# Altium PCB Main-Board-V1.1.PcbDoc (part 1 of 5)
Units mil, origin at the board's own origin, x right, y up, seen from the top; angles counter-clockwise.
Board outline 3599.72 x 1771.65 mil, 4 copper layers (Top Layer, Layer 1, Layer 2, Bottom Layer), stack 62.449 mil thick; 176 components, 132 nets, 634 pads, 296 vias.
Unrouted connection lines stored in the file: 17.
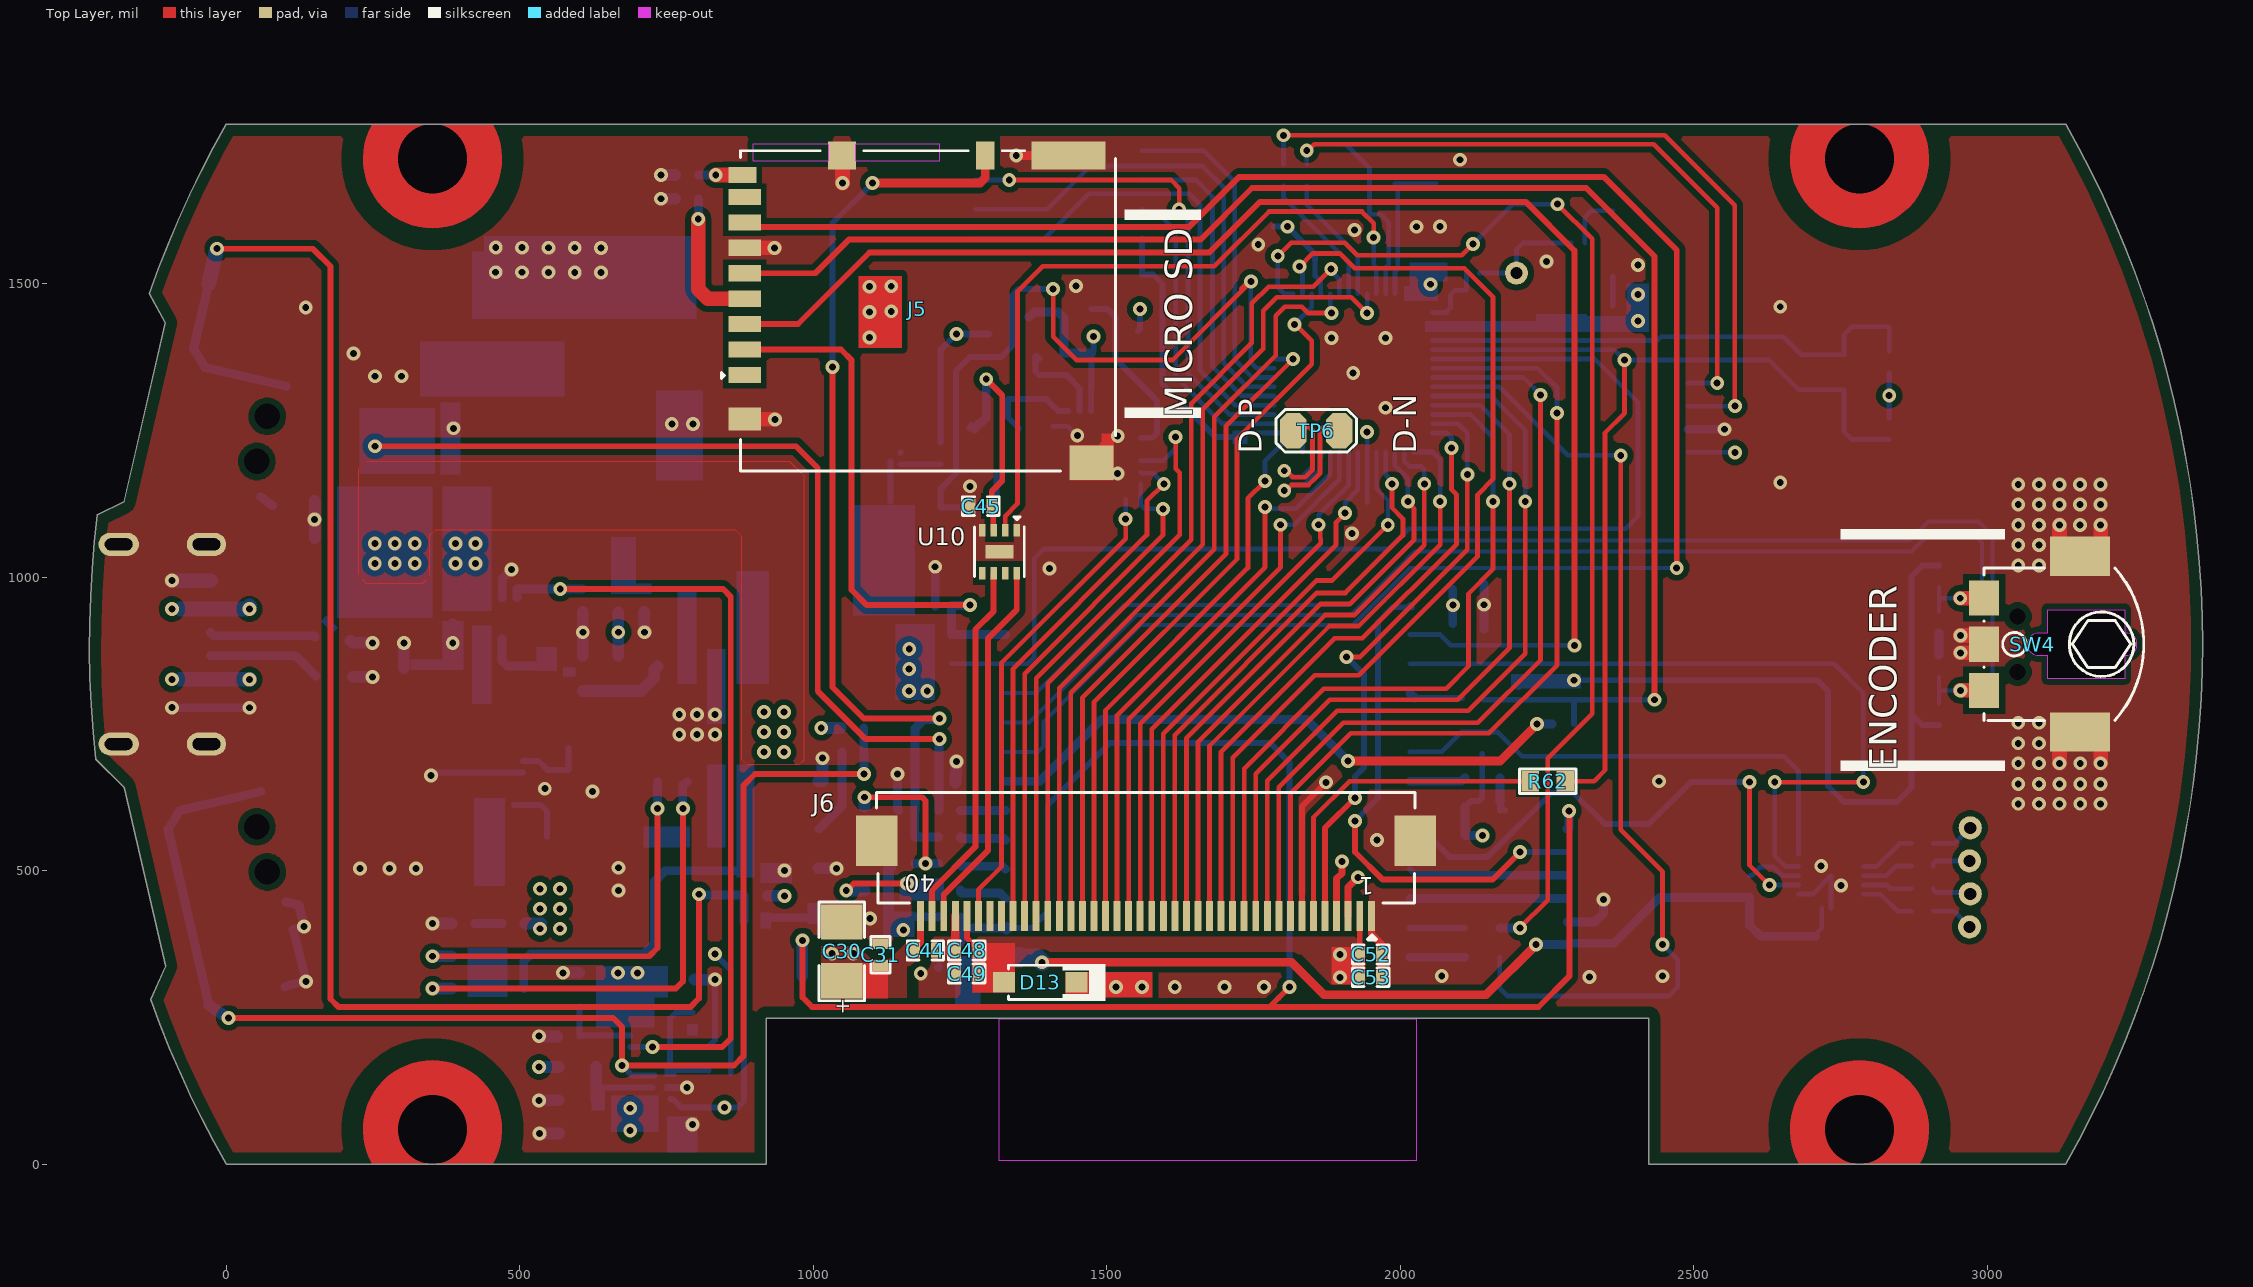
[diagram p0: Top Layer view]
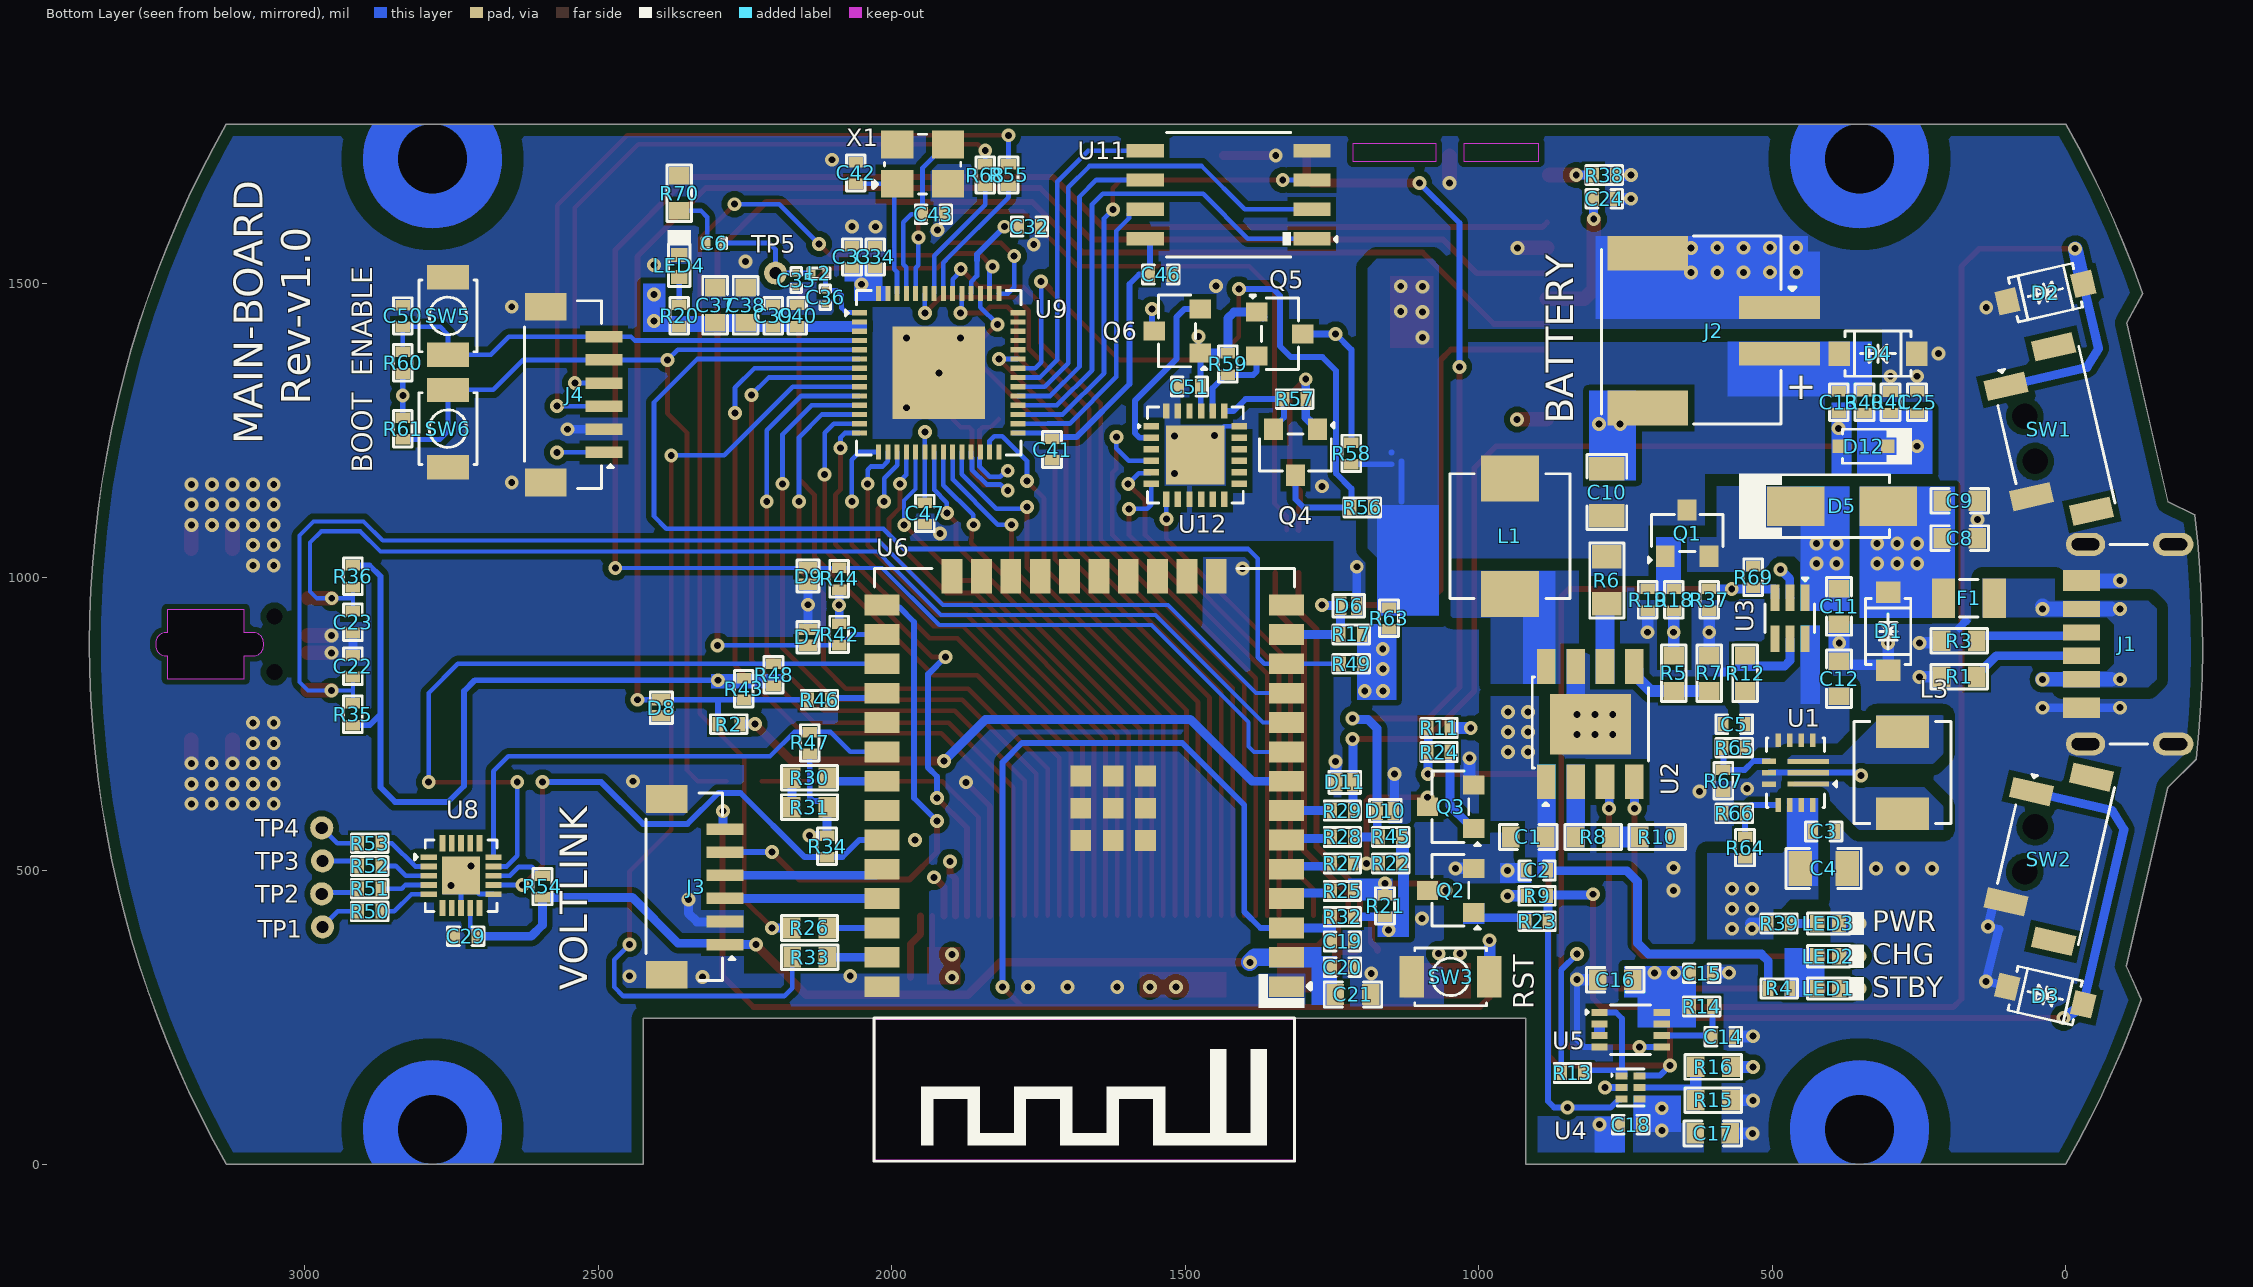
[diagram p1: Bottom Layer view, seen from below]
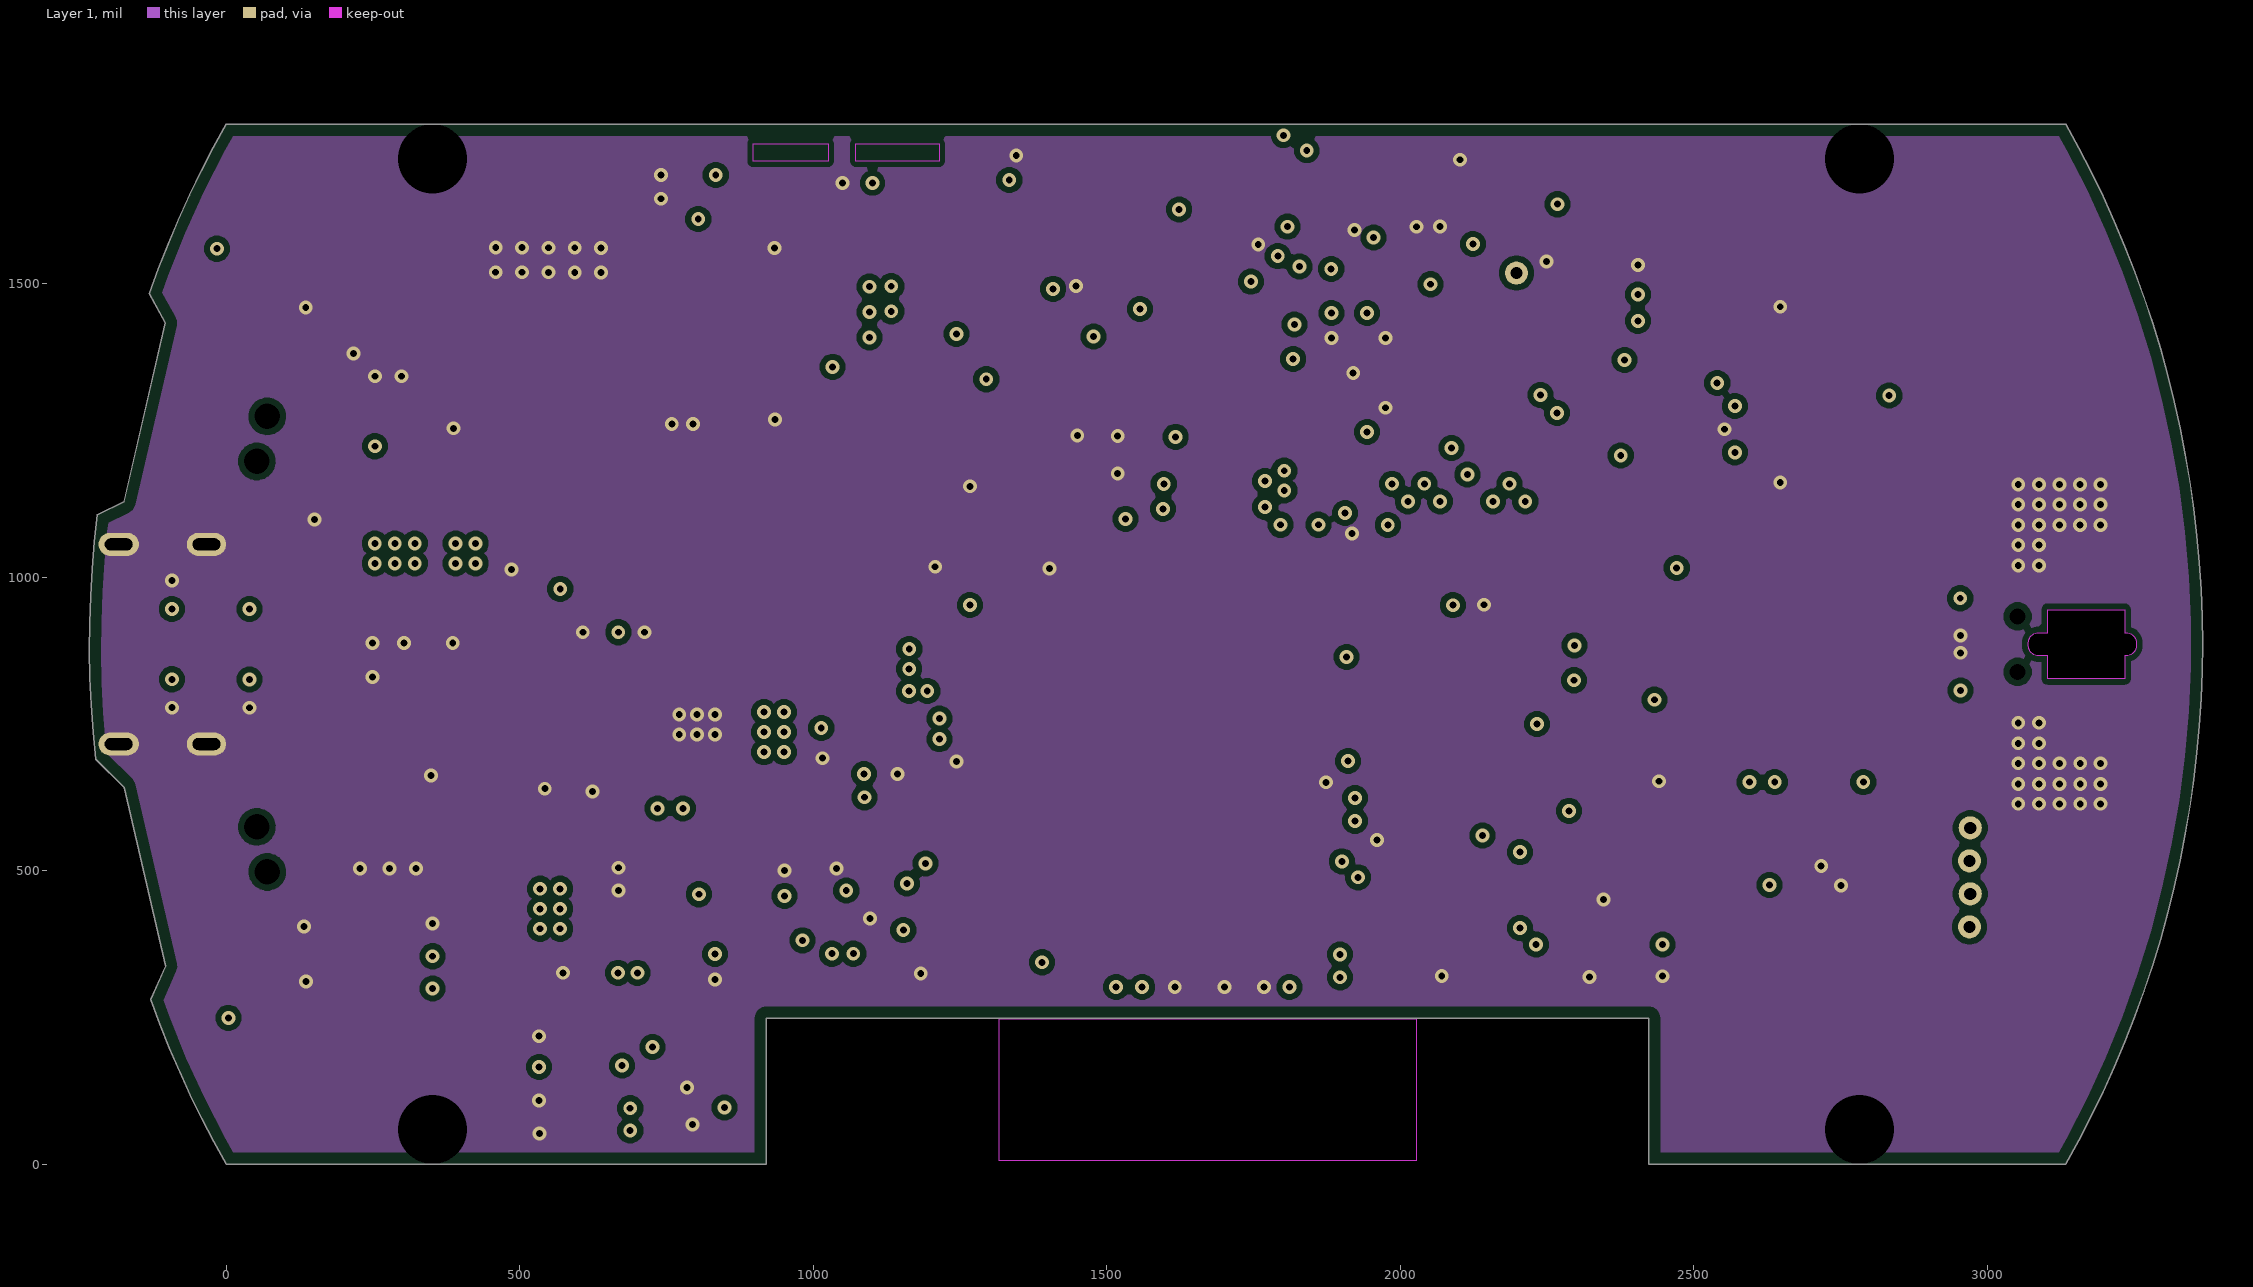
[diagram p2: Layer 1]
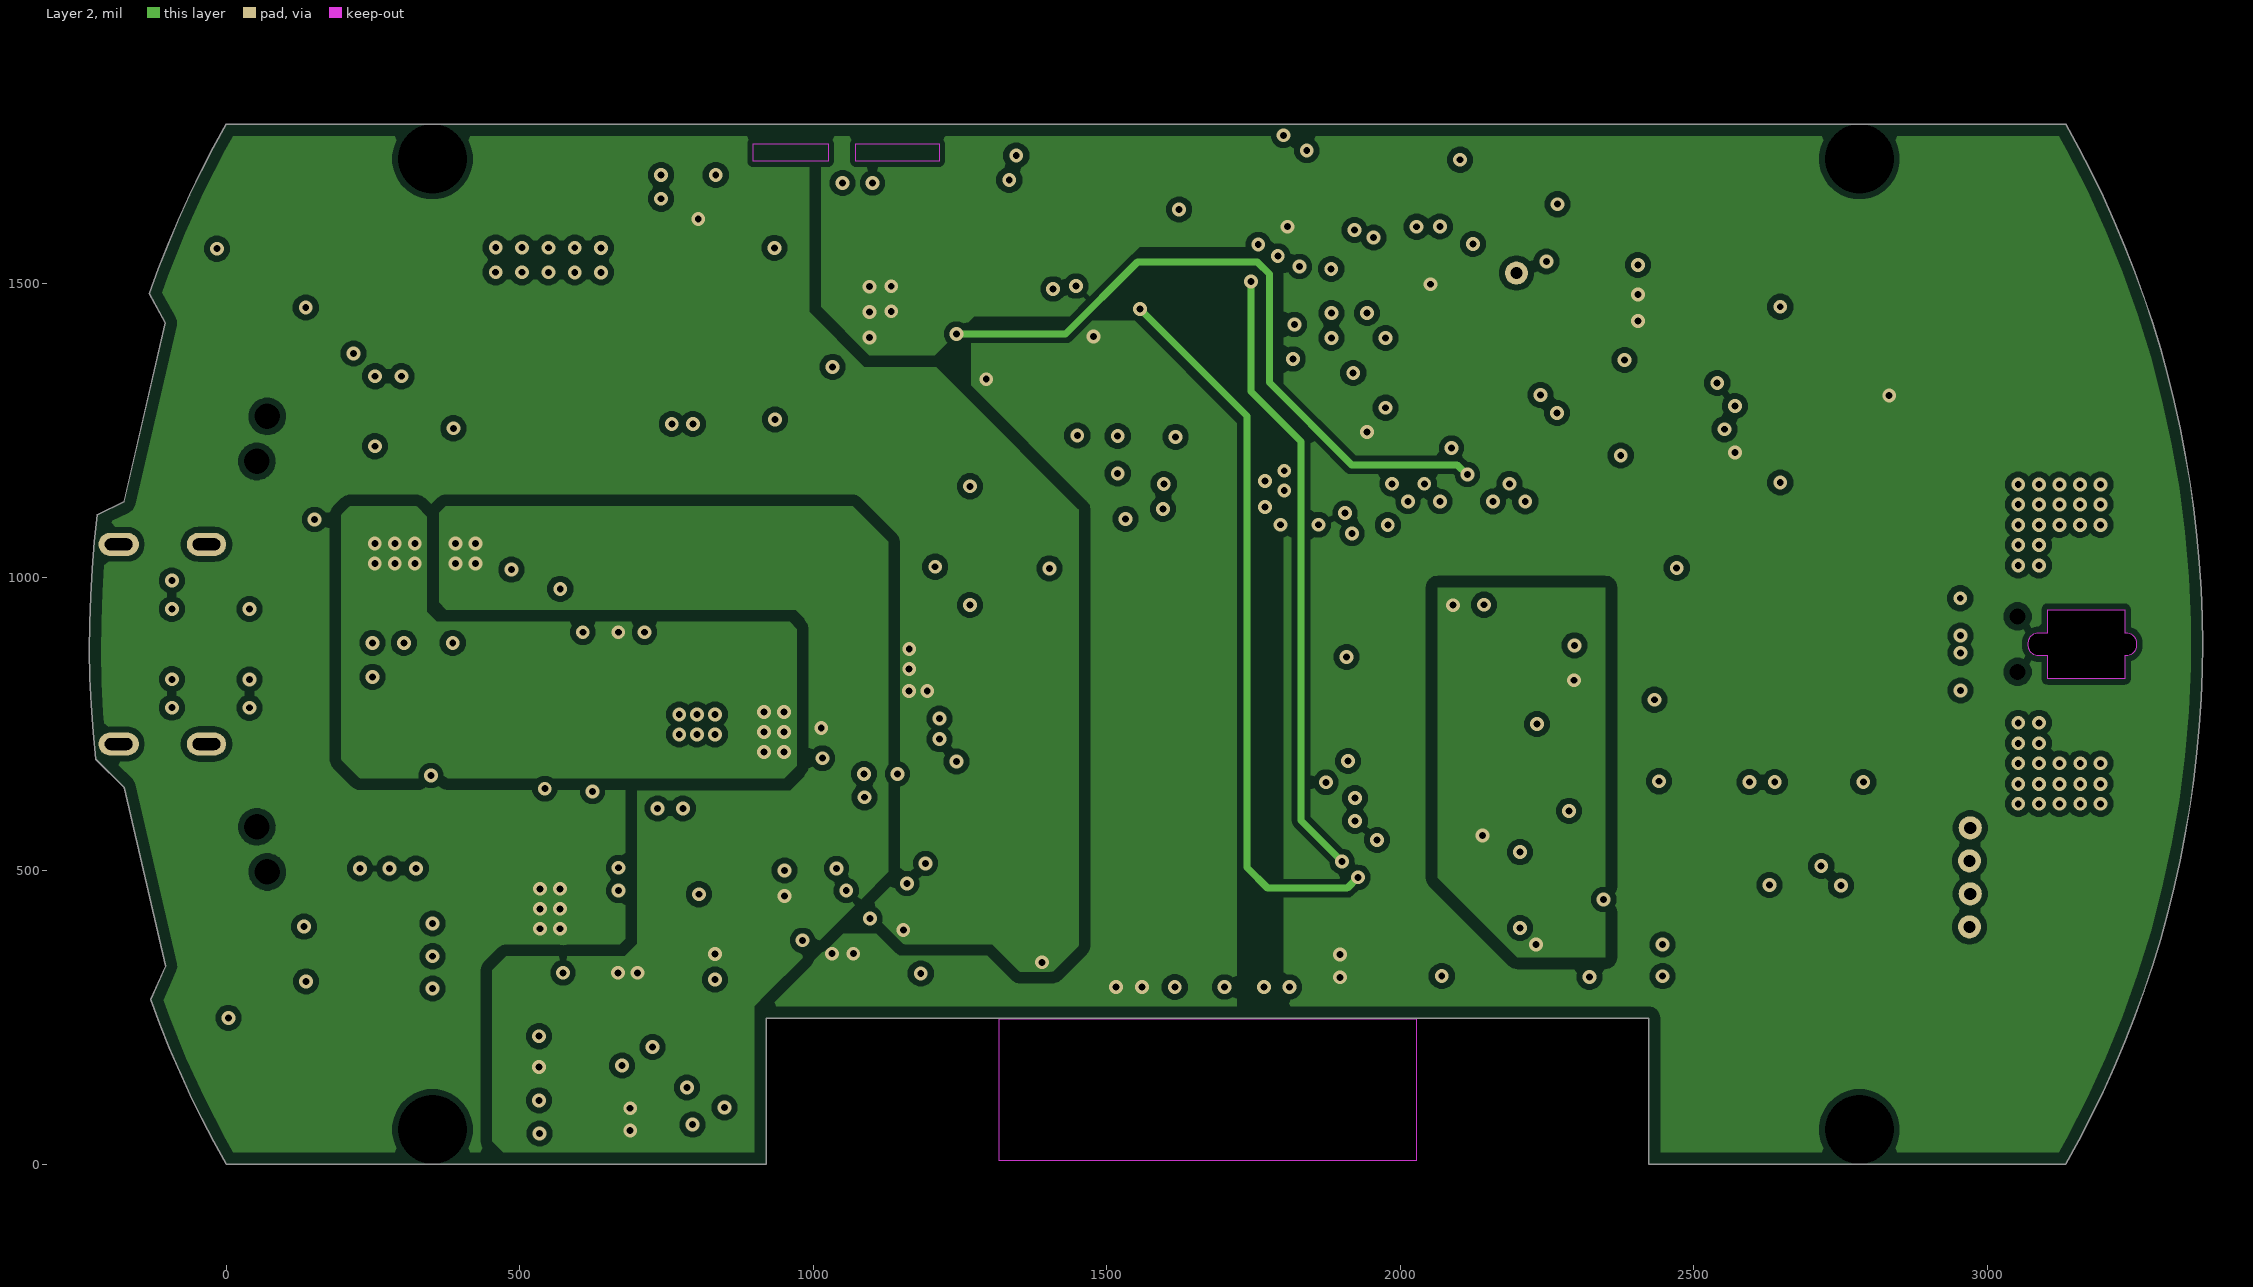
[diagram p3: Layer 2]
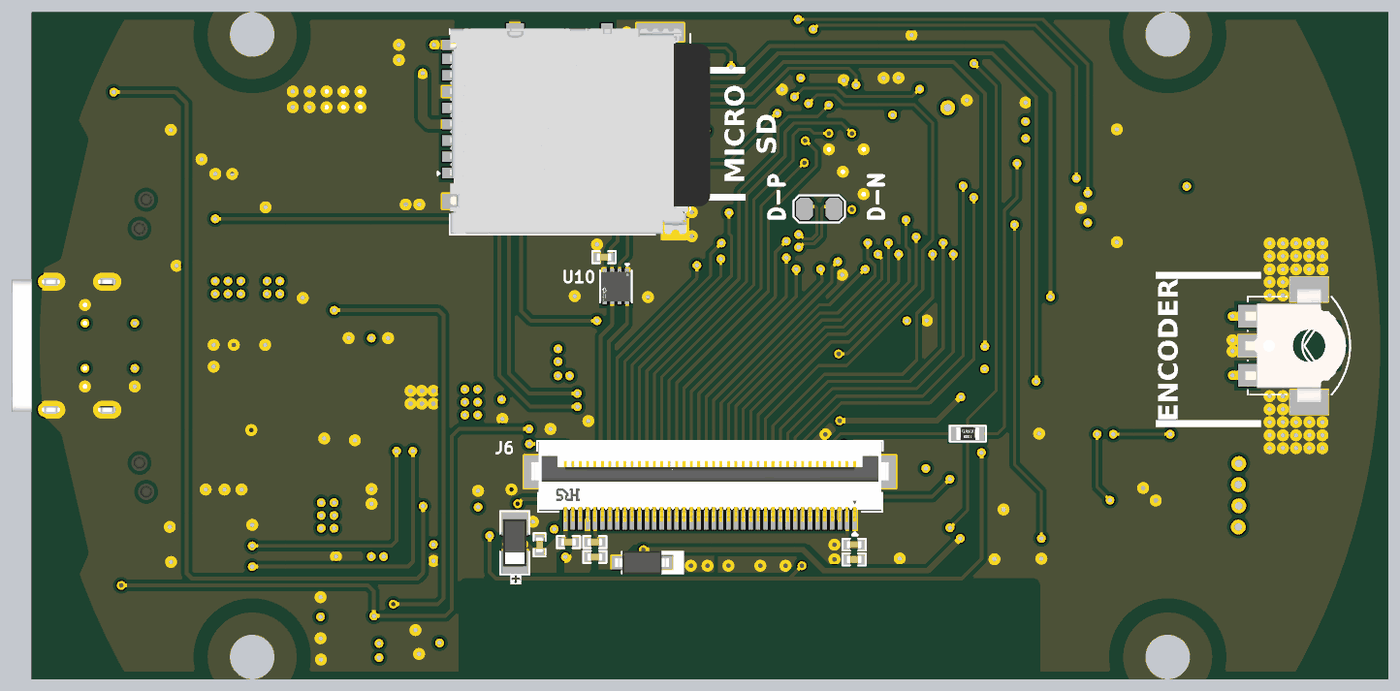
[diagram p6: 3D render of the assembled board from above, using the file's embedded part models]
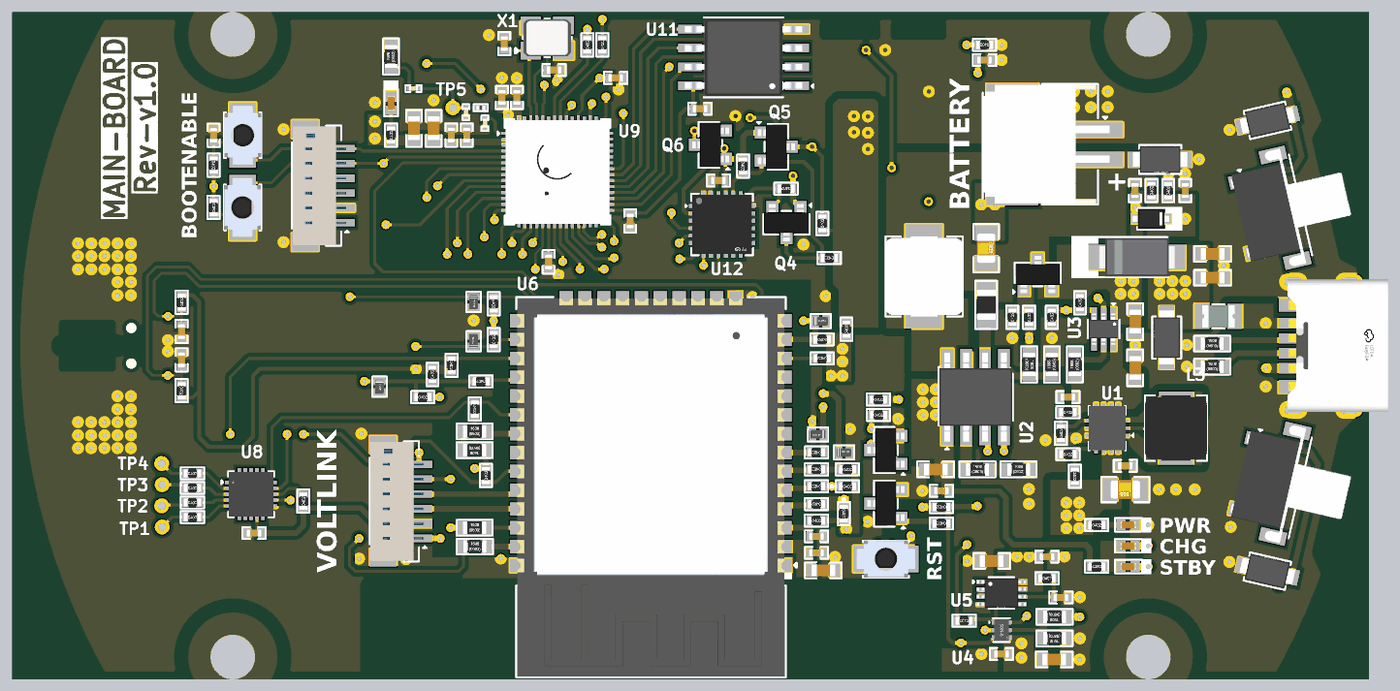
[diagram p7: 3D render of the assembled board from below, using the file's embedded part models]

## Layer stack, top to bottom
Top Solder: solder mask 0.4, Solder Resist, Dk 3.5
Top Layer: signal copper 1.378
Dielectric 2: prepreg 8.2839, PP-006, Dk 4.1
Layer 1: signal copper 0.598
Dielectric 1: dielectric 41.9291, FR-4, Dk 4.8
Layer 2: signal copper 0.598
Dielectric 3: prepreg 8.2839, PP-006, Dk 4.1
Bottom Layer: signal copper 1.378
Bottom Solder: solder mask 0.4, Solder Resist, Dk 3.5

## Board outline
-222.34,689.82 cw(c1569.7,885.13) -219.31,1106.51 -218.82,1106.36 -174.03,1128.39 -103.62,1433.37 -131.18,1482.83 cw(c1566.72,885.89) 0,1771.65 3133.72,1771.65 cw(c1566.86,885.83) 3133.72,0 2423.66,0 2423.66,248.66 920.25,248.66 920.25,0 0,0 cw(c1557.46,883.14) -128.45,280.38 -103.3,336.87 -173.7,641.84
cut-out: 3102.95,826.76 3102.95,866.14 3087.25,866.14 cw(c3087.25,883.14) 3070.25,883.14 3070.25,888.5 cw(c3087.25,888.5) 3087.25,905.5 3102.95,905.5 ccw(c3102.95,905.5) 3102.96,905.51 3102.96,944.87 3233.99,944.87 3233.99,905.51 3236.77,905.51 cw(c3236.77,888.5) 3253.78,888.51 3253.78,883.15 cw(c3236.77,883.15) 3236.77,866.15 3234.14,866.15 3234.14,826.76

## Design rules (kind name [scope] priority, off if disabled: settings)
BoardOutlineClearance [All] p1: gap=0 ignorepadtopadclearanceinfootprint=FALSE except(20: Poly-OutlineEdge)
Clearance "Diff Clearance" [InDifferentialPair('USB_D')] p1: gap=10 ignorepadtopadclearanceinfootprint=TRUE except(5: Track-Track; 6: Track-SMDPad; 7: Arc-SMDPad Track-Fill SMDPad-SMDPad SMDPad-Fill; 9.96: Poly-Region; 20: Poly-Poly)
Clearance [All] p2: gap=10 ignorepadtopadclearanceinfootprint=TRUE except(6: Track-SMDPad; 7: Arc-SMDPad Track-Track Track-Fill SMDPad-SMDPad SMDPad-Fill; 20: Poly-Poly)
ComponentClearance [All] p1: gap=0 collisioncheckmode=3 verticalgap=0 showdistances=FALSE
DiffPairsRouting [All] p1: maxlimit=10 minlimit=5 mostfreqgap=10 toplayer_maxgap=5 toplayer_prefgap=5 toplayer_minwidth=8 toplayer_maxwidth=8 toplayer_prefwidth=8 bottomlayer_maxgap=5 bottomlayer_prefgap=5 bottomlayer_minwidth=8 bottomlayer_maxwidth=8 bottomlayer_prefwidth=8 impedanceprofiledriven=TRUE impedanceprofileid={B2FD1A95-CDA7-4210-B10D-5F027658617E} impedanceprofilevalue=90.000000 maxuncoupledlength=500
HoleSize [All] p1: absolutevalues=TRUE maxlimit=1000 minlimit=1 maxpercent=80.000 minpercent=20.000
MinimumSolderMaskSliver [All] p1: minsoldermaskwidth=0
PolygonConnect [All] p1: connectstyle=Direct reliefconductorwidth=10 reliefentries=4 polygonreliefangle="90 Angle" airgapwidth=10
RoutingVias [All] p1: holewidth=11.81 width=23.62 viastyle="Through Hole" minholewidth=11.81 minwidth=23.62 maxholewidth=11.81 maxwidth=23.62
SilkToSilkClearance [All] p1: silktosilkclearance=0
SilkToSolderMaskClearance [IsPad] p1: minsilkscreentomaskgap=0 clearancetoexposedcopper=TRUE
SolderMaskExpansion [All] p1: expansion=4 istentingtop=FALSE
Width [All] p1: maxlimit=50 minlimit=7 preferedwidth=15
24 further rules are at their usual default settings.

## Classes and differential pairs
component class U_Screen-Controller-Sheet: C6 C30 C31 C32 C33 C34 C35 C36 C37 C38 C39 C40 C41 C42 C43 C44 C45 C46 C47 C48 C49 C50 C51 C52 C53 D13 J4 J6 L2 Q4 Q5 Q6 R55 R56 R57 R58 R59 R60 R61 R62 R68 R70 SW5 SW6 TP5 TP6 U9 U10 U11 U12 X1
component class U_Power-Sheet: C1 C2 C3 C4 C5 C8 C9 C10 C11 C12 C13 C14 C15 C16 C17 C18 D1 D2 D3 D4 D5 F1 J1 J2 L1 L3 LED1 LED2 LED3 LED4 Q1 R1 R3 R4 R5 R6 R7 R8 R9 R10 R11 R12 R13 R14 R15 R16 R18 R19 R20 R37 R39 R40 R41 R63 R64 R65 R66 R67 R69 SW1 SW2 U1 U2 U3 U4 U5
component class U_Controller-Sheet: C19 C20 C21 C22 C23 C24 C25 C29 D6 D7 D8 D9 D10 D11 D12 J3 J5 Q2 Q3 R2 R17 R21 R22 R23 R24 R25 R26 R27 R28 R29 R30 R31 R32 R33 R34 R35 R36 R38 R42 R43 R44 R45 R46 R47 R48 R49 R50 R51 R52 R53 R54 SW3 SW4 TP1 TP2 TP3 TP4 U6 U8
differential pair USB_D: +USB_D_P -USB_D_N

## Components (designator, comment, footprint, x,y, rotation, side; value= is the part's Value field where it differs from the comment)
C1 "10uF" Cap-0603 915.79,557.36 r180 bottom locked
C2 "0.1uF" Cap-0402 900.79,500.45 r180 bottom locked value=100nF
C3 "10uF" Cap-0402 412.51,566.86 r0 bottom
C4 "47uF" Cap-0805 412.52,503.86 r0 bottom
C5 "10uF" Cap-0402 564.87,749.61 r180 bottom
C6 "4.7pF" CAP-0201 2302.61,1569.09 r0 bottom
C8 "1uF" Cap-0603 180.76,1066.54 r0 bottom locked
C9 "10nF" Cap-0603 180.76,1130.04 r0 bottom locked
C10 "22uF" Cap-0805 782,1145 r270 bottom locked
C11 "10uF" Cap-0603 386.39,950.06 r270 bottom locked
C12 "10uF" Cap-0603 386.39,827.06 r90 bottom locked
C13 "0.1uF" Cap-0402 386.95,1298 r90 bottom locked value=100nF
C14 "0.1uF" Cap-0402 583.47,217.21 r0 bottom locked value=100nF
C15 "0.1uF" Cap-0402 620.47,325.31 r0 bottom locked value=100nF
C16 "1uF" Cap-0603 767.43,314.31 r180 bottom locked
C17 "1uF" Cap-0603 601.47,52.31 r0 bottom locked
C18 "0.1uF" Cap-0402 741.43,67.31 r180 bottom locked value=100nF
C19 "1uF" Cap-0402 1232.32,379.51 r180 bottom
C20 "100nF" Cap-0402 1232.32,335.66 r0 bottom locked
C21 "22uF" Cap-0603 1214.32,289.08 r0 bottom locked
C22 "0.01uF" Cap-0402 2918,848.43 r270 bottom locked
C23 "0.01uF" Cap-0402 2918,923.37 r90 bottom locked
C24 "0.1uF" Cap-0402 786.06,1644.61 r180 bottom locked value=100nF
C25 "0.1uF" Cap-0402 253.35,1298 r270 bottom locked value=100nF
C29 "100nF" Cap-0402 2725.73,388.36 r0 bottom
C30 "47uF" Tant-1206 1048.64,362.4 r90 top
C31 "100nF" Cap-0402 1114.56,356.98 r270 top
C32 "100nF" Cap-0402 1765.52,1597.24 r0 bottom
C33 "1uF" Cap-0402 2067.8,1545.41 r270 bottom
C34 "100nF" Cap-0402 2028.03,1545.41 r270 bottom
C35 "2.7pF" CAP-0201 2163,1506.19 r90 bottom
C36 "4.7pF" CAP-0201 2113.06,1476.99 r90 bottom
C37 "22uF" Cap-0603 2301,1463.5 r270 bottom
C38 "22uF" Cap-0603 2249,1463.51 r270 bottom
C39 "100nF" Cap-0402 2202,1445.5 r270 bottom
C40 "100nF" Cap-0402 2161,1445.5 r270 bottom
C41 "1uF" Cap-0402 1727.04,1217.45 r90 bottom
C42 "18pF" Cap-0402 2061.34,1688.5 r270 bottom
C43 "18pF" Cap-0402 1929.06,1618.23 r0 bottom
C44 "1uF" Cap-0402 1191.23,364.15 r180 top
C45 "4.7uF" Cap-0402 1285.57,1121 r0 top
C46 "100nF" Cap-0402 1541.72,1515.58 r180 bottom
C47 "100nF" Cap-0402 1943.62,1108.5 r90 bottom
C48 "100nF" Cap-0402 1261.5,364.14 r0 top
C49 "1uF" Cap-0402 1261.5,324.76 r0 top
C50 "1uF" Cap-0402 2833.07,1444.95 r90 bottom
C51 "1uF" Cap-0402 1492.83,1324.71 r180 bottom
C52 "100nF" Cap-0402 1949.53,357.36 r180 top
C53 "1uF" Cap-0402 1949.53,318.36 r180 top
D1 "SMF5.0CA" "SOD-123 (Bi-Directional)" 302.65,907.56 r270 bottom locked
D2 "SMF5.0CA" "SOD-123 (Bi-Directional)" 34.78,1484.62 r347 bottom locked
D3 "SMF5.0CA" "SOD-123 (Bi-Directional)" 35.22,287.13 r13 bottom locked
D4 "SMF5.0CA" "SOD-123 (Bi-Directional)" 320,1380.63 r180 bottom locked
D5 "SM340A" SMA 381.39,1121 r180 bottom locked
D6 "LESD8D3.3CAT5G" "SOD-882 Bi Directional" 1221.55,951.1 r0 bottom locked
D7 "LESD8D3.3CAT5G" "SOD-882 Bi Directional" 2142.69,897.64 r270 bottom
D8 "LESD8D3.3CAT5G" "SOD-882 Bi Directional" 2392.48,777.33 r90 bottom
D9 "LESD8D3.3CAT5G" "SOD-882 Bi Directional" 2142.69,1001.95 r90 bottom
D10 "LESD8D3.3CAT5G" "SOD-882 Bi Directional" 1159.15,602.36 r0 bottom locked
D11 "LESD8D3.3CAT5G" "SOD-882 Bi Directional" 1228.32,650.36 r180 bottom locked
D12 "MM3Z3V3B" SOD323F 344.67,1223 r180 bottom locked
D13 "1N4148W-7-F" SOD-123 1386.69,309.83 r0 top value=2pF
F1 "BSMD0805L-200" Fuse-0805 165.27,964.09 r0 bottom locked
J1 "TYPE-C-31-M-17" TYPE-C-31-M-17_ -104.8,885.83 r90 bottom locked
J2 "WAFER-PH2.0-2PWB" WAFER-PH2.0-2PWB 600,1420 r270 bottom
J3 "Voltlink Target" "Voltlink Target" 2333.43,472.44 r90 bottom locked
J4 "Voltlink Target" "Voltlink Target" 2540,1311 r90 bottom
J5 "DM3BT-DSF-PEJS" DM3BT-DSF-PEJS 1177,1456.67 r90 top locked
J6 "FH12-40S-0.5SH(55)" FH12-40S-0.5SH(55) 1566.86,486.98 r180 top
L1 "2.2uH" YSPI0520-2R2M_ 947,1069.83 r90 bottom locked
L2 "1.6nH" IND-0201 2123.88,1518 r180 bottom
L3 "1uH" PSPMAA0412-1R0M-ANP_ 278.07,666.98 r270 bottom
LED1 "XZVG68W-2" LED-0402 404.95,299.17 r180 bottom locked
LED2 "Red" LED-0402 404.95,354.17 r180 bottom locked
LED3 "Red" LED-0402 405,410 r180 bottom locked
LED4 "Red" LED-0402 2362,1530.08 r90 bottom
Q1 "AO3407" SOT-23 645,1075 r180 bottom locked
Q2 "AO3400A" sot-23 1048.1,466.5 r90 bottom locked
Q3 "AO3400A" sot-23 1048.1,608.86 r90 bottom locked
Q4 "BSS123" sot-23 1312.35,1212.78 r0 bottom
Q5 "BSS123" SOT-23 1339.08,1414.39 r270 bottom
Q6 "BSS123" SOT-23 1513.7,1419.4 r90 bottom
R1 "5.1K" Res-0603 181.76,830.15 r0 bottom locked
R2 "0R" Res-0402 2277.54,749.6 r180 bottom
R3 "5.1K" Res-0603 181.76,891.65 r0 bottom locked
R4 "1K" Res-0402 488.35,299.31 r0 bottom locked
R5 "0R" Res-0603 668,836.06 r90 bottom locked
R6 "1K" RES-0805 782,994.54 r90 bottom locked value=1kR
R7 "DNP" Res-0603 607.5,836.06 r270 bottom locked
R8 "953R" Res-0603 805.08,557.36 r0 bottom locked
R9 "10K" Res-0402 900.79,457.13 r0 bottom locked
R10 "15R" Res-0603 695.83,557.36 r0 bottom locked
R11 "10K" Res-0402 1067.68,743 r180 bottom locked
R12 "1K" Res-0603 546.37,836.06 r270 bottom locked value=1kR
R13 "1.5K" Res-0402 840.47,155.49 r0 bottom locked
R14 "4.7K" Res-0402 620.47,268.49 r180 bottom locked
R15 "0R" Res-0603 600.47,108.72 r180 bottom locked
R16 "DNP" Res-0603 600.47,165.72 r180 bottom locked
R17 "10K" Res-0402 1217.32,902.36 r180 bottom locked
R18 "47K" Res-0402 668,961.54 r90 bottom locked
R19 "100K" Res-0402 712.37,961.54 r90 bottom locked
R20 "DNP" Res-0402 2362,1445.51 r90 bottom
R21 "10K" Res-0402 1159.65,439.86 r270 bottom
R22 "10K" Res-0402 1150.15,512.36 r180 bottom
R23 "1K" Res-0402 900.79,413.96 r0 bottom locked
R24 "1K" Res-0402 1067.68,702.06 r180 bottom locked
R25 "100R" Res-0402 1232.32,465.36 r0 bottom locked
R26 "0R" Res-0603 2140.2,402.36 r0 bottom locked
R27 "100R" Res-0402 1232.33,512.36 r0 bottom locked
R28 "0R" Res-0402 1232.33,557.36 r0 bottom locked
R29 "0R" Res-0402 1232.32,602.36 r0 bottom locked
R30 "0R" Res-0603 2140.2,658.36 r0 bottom
R31 "DNP" Res-0603 2140.2,608.36 r180 bottom
R32 "10K" Res-0402 1232.32,421.36 r180 bottom
R33 "0R" Res-0603 2139.69,352.36 r0 bottom
R34 "4.7K" Res-0402 2110.2,541.34 r90 bottom
R35 "10K" Res-0402 2918,766.5 r270 bottom locked
R36 "10K" Res-0402 2918,1001.5 r90 bottom locked
R37 "DNP" Res-0402 607.5,961.54 r90 bottom locked
R38 "0R" Res-0402 786.06,1685.01 r0 bottom locked
R39 "DNP" Res-0402 488.5,410 r180 bottom locked
R40 "200K" Res-0402 343,1298 r90 bottom locked value=200kR
R41 "100K" Res-0402 298.54,1297.78 r90 bottom locked
R42 "10K" Res-0402 2089.64,902.36 r90 bottom
R43 "10K" Res-0402 2252.22,809.61 r90 bottom
R44 "10K" Res-0402 2089.64,997.23 r270 bottom
R45 "10K" Res-0402 1150.15,557.36 r180 bottom
R46 "DNP" Res-0402 2123.2,791.11 r0 bottom
R47 "4.7K" Res-0402 2139.69,717.6 r270 bottom
R48 "4.7K" Res-0402 2201.43,833.86 r270 bottom
R49 "4.7K" Res-0402 1217.08,852.36 r0 bottom
R50 "10K" Res-0402 2889.38,430.64 r180 bottom
R51 "10K" Res-0402 2889.37,469.35 r180 bottom
R52 "10K" Res-0402 2889.37,508.06 r180 bottom
R53 "10K" Res-0402 2889.37,546.76 r180 bottom
R54 "4.7K" Res-0402 2595,472.97 r90 bottom
R55 "499R" Res-0402 1801.02,1685.05 r90 bottom
R56 "4.7K" Res-0402 1198.63,1118.7 r0 bottom
R57 "4.7K" Res-0402 1313.34,1303.28 r0 bottom
R58 "4.7K" Res-0402 1217.13,1210.77 r90 bottom
R59 "4.7K" Res-0402 1427.48,1363.13 r270 bottom
R60 "10K" Res-0402 2833.08,1365.42 r270 bottom
R61 "10K" Res-0402 2833.08,1253.06 r90 bottom
R62 "DNP" Res-0603 2251.43,652.36 r0 top
R63 "0R" Res-0402 1153,929.72 r90 bottom
R64 "562K" Res-0402 546.37,539.36 r270 bottom
R65 "147K" Res-0402 564.87,709.41 r180 bottom value=147kR
R66 "180K" Res-0402 564.87,597.65 r180 bottom value=180kR
R67 "95.3K" Res-0402 583.37,653.2 r90 bottom
R68 "0R" Res-0402 1840.82,1685.05 r90 bottom
R69 "1K" Res-0402 532.64,1000.1 r90 bottom
R70 "49.9R" Res-0603 2362.01,1654 r270 bottom
SW1 "TP12422673" TP12422673 34.32,1241.65 r257 bottom locked
SW2 "TP12422673" TP12422673 34.32,530 r283 bottom locked
SW3 "GT-TC032A-H015-L1" GT-TC032A-H015-L1 1048.1,319.08 r0 bottom locked
SW4 "EC05E1220401" EC05E1220401 3076.38,885.82 r270 top locked
SW5 "GT-TC032A-H015-L1" GT-TC032A-H015-L1 2756,1444.95 r90 bottom
SW6 "GT-TC032A-H015-L1" GT-TC032A-H015-L1 2756,1253.06 r270 bottom
TP1 "0.5mm Test Pad" "0.5mm Test Pad" 2969.73,404.36 r90 bottom
TP2 "0.5mm Test Pad" "0.5mm Test Pad" 2971.04,460.57 r90 bottom
TP3 "0.5mm Test Pad" "0.5mm Test Pad" 2969.73,516.79 r90 bottom
TP4 "0.5mm Test Pad" "0.5mm Test Pad" 2971.04,573 r90 bottom
TP5 "0.5mm Test Pad" "0.5mm Test Pad" 2198,1518 r90 bottom
TP6 "2 Test Pad" "2 Test Pad" 1817.64,1249.26 r0 top
U1 "TPS630250RNCR" "14-VQFN-HR (3x2.5)" 468.41,666.98 r0 bottom
U2 "SLM6600" 8-SO-EP_ 810,749.61 r90 bottom locked
U3 "TPS22919DCKR" SC-70-6 470,930 r270 bottom locked
U4 "DNP" "6-SON (1.45x1)" 741.43,130.81 r180 bottom locked
U5 "DNP" VFSOP-8-2.3mm 741.43,228.96 r180 bottom locked
U6 "ESP32-WROOM-32E-N8R2" "38-SMD Module" 1672.05,651.97 r0 bottom locked
U8 "AT42QT1070-MMHR" "20-VQFN (3x3)" 2733.73,491.47 r180 bottom
U9 "ESP32-S3R8" "56-QFN (7x7)" 1920,1348 r180 bottom
U10 "AW9364DNR" DFN-8-EP(2x2) 1317.18,1043.36 r270 top
U11 "W25Q128JVSIQ" "SOIC-8 (208 mil)" 1426.29,1651.58 r0 bottom
U12 "XL9535QF24" QFN-24(4x4) 1482.99,1207.94 r180 bottom
X1 "40MHz" X322540MPB4SI_ 1947.56,1703.46 r180 bottom value=40MHZ

## Footprints (in the part's own frame and the unit in brackets; to place one, negate y for a bottom-side part, rotate by r counter-clockwise, add the part's x,y. Pads: shape width x height; smd on the part's side, far side on the other; paste and mask are expansions set on the pad)
"0.5mm Test Pad" [mm]
  round 1 hole 0.52: 1(0,0)
"2 Test Pad" [mil]
  oct 45x60 smd: 1(0,0) 2(78.74,0)
  silkscreen extent -29,-36 108,36
"6-SON (1.45x1)" [mm]
  rect 0.52x0.3 smd paste+0 mask+0.051: 1(-0.385,0.5) 2(-0.385,0) 3(-0.385,-0.5) 4(0.385,-0.5) 5(0.385,0) 6(0.385,0.5)
  silkscreen extent -0.83,-0.8 0.58,0.8, body extent -0.5,-0.72 0.5,0.73, height 0.56
8-SO-EP_ [mm]
  rect 1.505x0.802 smd: 1(-2.497,1.905) 2(-2.497,0.635) 3(-2.497,-0.635) 4(-2.497,-1.905) 5(2.498,-1.905) 6(2.498,-0.635) 7(2.497,0.635) 8(2.498,1.905)
  rect 2.613x3.502 smd: 9(0,0)
  silkscreen extent -3.53,-2.51 2.03,2.51, body extent -3,-2.45 3,2.45, height 1.7
"14-VQFN-HR (3x2.5)" [mm]
  rect 1.79x0.22 smd: 1(-0.755,0.49) 3(-0.755,-0.49)
  rect 1.79x0.24 smd: 2(-0.755,0)
  rect 0.24x0.6 smd: 4(-0.95,-1.4) 5(-0.45,-1.4) 6(0.05,-1.4) 7(0.55,-1.4) 11(0.55,1.4) 12(0.05,1.4) 13(-0.45,1.4) 14(-0.95,1.4)
  rect 0.6x0.24 smd: 8(0.95,-0.5) 9(0.95,0) 10(0.95,0.5)
  silkscreen extent -1.97,-1.5 1.05,1.5, body extent -1.45,-1.5 1.05,1.5, height 1
"20-VQFN (3x3)" [mm]
  rect 0.7x0.25 smd: 1(-1.4,0.8) 2(-1.4,0.4) 3(-1.4,0) 4(-1.4,-0.4) 5(-1.4,-0.8) 11(1.4,-0.8) 12(1.4,-0.4) 13(1.4,0) 14(1.4,0.4) 15(1.4,0.8)
  rect 0.25x0.7 smd: 6(-0.8,-1.4) 7(-0.4,-1.4) 8(0,-1.4) 9(0.4,-1.4) 10(0.8,-1.4) 16(0.8,1.4) 17(0.4,1.4) 18(0,1.4) 19(-0.4,1.4) 20(-0.8,1.4)
  rect 1.65x1.65 smd: 21(0,0)
  silkscreen extent -2.01,-1.55 1.55,1.55, body extent -1.5,-1.5 1.5,1.5, height 0.59
"38-SMD Module" [mm]
  rect 1.5x0.9 smd: 1(-8.75,8.88) 2(-8.75,7.61) 3(-8.75,6.34) 4(-8.75,5.07) 5(-8.75,3.8) 6(-8.75,2.53) 7(-8.75,1.26) 8(-8.75,-0.01) 9(-8.75,-1.28) 10(-8.75,-2.55) 11(-8.75,-3.82) 12(-8.75,-5.09) 13(-8.75,-6.36) 14(-8.75,-7.63) 25(8.75,-7.63) 26(8.75,-6.36) 27(8.75,-5.09) 28(8.75,-3.82) 29(8.75,-2.55) 30(8.75,-1.28) 31(8.75,-0.01) 32(8.75,1.26) 33(8.75,2.53) 34(8.75,3.8) 35(8.75,5.07) 36(8.75,6.34) 37(8.75,7.61) 38(8.75,8.88)
  rect 0.9x1.5 smd: 15(-5.71,-8.88) 16(-4.44,-8.88) 17(-3.17,-8.88) 18(-1.9,-8.88) 19(-0.63,-8.88) 20(0.64,-8.88) 21(1.91,-8.88) 22(3.18,-8.88) 23(4.45,-8.88) 24(5.72,-8.88)
  rect 0.9x0.9 smd: 39(-2.65,2.56) 40(-1.25,2.56) 41(0.15,2.56) 42(-2.65,1.16) 43(-1.25,1.16) 44(0.15,1.16) 45(-2.65,-0.24) 46(-1.25,-0.24) 47(0.15,-0.24)
  Keep-Out Layer region: -9.042,16.383 9.042,16.383 9.042,10.287 -9.042,10.287
  silkscreen extent -9.8,-9.22 9.09,16.43, body extent -9,-9.12 9,16.38, height 3.25
"56-QFN (7x7)" [mm]
  rect 0.65x0.22 smd mask+0.055: 1(-3.425,2.6) 2(-3.425,2.2) 3(-3.425,1.8) 4(-3.425,1.4) 5(-3.425,1) 6(-3.425,0.6) 7(-3.425,0.2) 8(-3.425,-0.2) 9(-3.425,-0.6) 10(-3.425,-1) 11(-3.425,-1.4) 12(-3.425,-1.8) 13(-3.425,-2.2) 14(-3.425,-2.6) 29(3.425,-2.6) 30(3.425,-2.2) 31(3.425,-1.8) 32(3.425,-1.4) 33(3.425,-1) 34(3.425,-0.6) 35(3.425,-0.2) 36(3.425,0.2) 37(3.425,0.6) 38(3.425,1) 39(3.425,1.4) 40(3.425,1.8) 41(3.425,2.2) 42(3.425,2.6)
  rect 0.22x0.65 smd mask+0.055: 15(-2.6,-3.425) 16(-2.2,-3.425) 17(-1.8,-3.425) 18(-1.4,-3.425) 19(-1,-3.425) 20(-0.6,-3.425) 21(-0.2,-3.425) 22(0.2,-3.425) 23(0.6,-3.425) 24(1,-3.425) 25(1.4,-3.425) 26(1.8,-3.425) 27(2.2,-3.425) 28(2.6,-3.425) 43(2.6,3.425) 44(2.2,3.425) 45(1.8,3.425) 46(1.4,3.425) 47(1,3.425) 48(0.6,3.425) 49(0.2,3.425) 50(-0.2,3.425) 51(-0.6,3.425) 52(-1,3.425) 53(-1.4,3.425) 54(-1.8,3.425) 55(-2.2,3.425) 56(-2.6,3.425)
  rect 4x4 smd mask+0.055: 57(0,0)
  silkscreen extent -4.04,-3.56 3.56,3.56, body extent -3.5,-3.51 3.5,3.49, height 0.92
CAP-0201 [mm]
  rect 0.3x0.3 smd mask+0.055: 1(-0.3,0) 2(0.3,0)
  silkscreen extent -0.53,-0.23 0.53,0.23, body extent -0.3,-0.15 0.3,0.15, height 0.28
Cap-0402 [mil]
  rect 18x25 smd mask+2.36: 1(-18.5,0) 2(18.5,0)
  silkscreen extent -31,-16 31,16, body extent -20,-10 20,10, height 19
Cap-0603 [mil]
  rect 30x35 smd mask+2.36: 1(-30,0) 2(30,0)
  silkscreen extent -49,-21 49,21, body extent -32,-16 31,16, height 34
Cap-0805 [mil] "SMD 0805"
  rect 40x60 smd mask+2.76: 1(-40,0) 2(40,0)
  silkscreen extent -64,-34 64,34, body extent -39,-25 39,25, height 30
DFN-8-EP(2x2) [mm]
  rect 0.55x0.28 smd: 1(-0.928,0.75) 2(-0.928,0.25) 3(-0.928,-0.25) 4(-0.928,-0.75) 5(0.928,-0.75) 6(0.928,-0.25) 7(0.928,0.25) 8(0.928,0.75)
  rect 0.6x1.2 smd: 9(0,0)
  silkscreen extent -1.51,-1.08 1.08,1.08, body extent -1.01,-1.01 1.01,1.01, height 0.77
DM3BT-DSF-PEJS [mm]
  rect 0.7x1.4 smd: 1(-2.85,7.45) 2(-1.75,7.45) 3(-0.65,7.45) 4(0.45,7.45) 5(1.55,7.45) 6(2.65,7.45) 7(3.75,7.45) 8(4.85,7.45)
  rect 1x1.4 smd: S1(-4.75,7.45)
  rect 1.2x1.2 smd: S2(6.65,3.25)
  rect 1.2x3.2 smd: S3(6.65,-6.55)
  rect 1.5x1.9 smd paste-2 mask+0: S4(-6.65,-7.55)
  rect 1.2x0.8 smd: SW-A(6.65,-2.95)
  rect 0.7x1.2 smd: SW-B(5.8,7.55)
  Top Layer region: -5.9,-7.85 -5.75,-8 -5.4,-8 -5.4,-8.5 -7.4,-8.5 -7.4,-6.6 -5.9,-6.6
  Keep-Out Layer region: 7.15,-0.95 6.4,-0.95 6.4,2.65 7.15,2.65
  Keep-Out Layer region: 7.15,3.85 6.4,3.85 6.4,7.1 7.15,7.1
  silkscreen extent -7,-8.58 6.85,8.46, body extent -6.96,-9.93 6.89,7.62, height 1.8
EC05E1220401 [mm]
  rect 1.7x2.6 smd paste+0 mask+0.051: 4(-3.8,2.075) 5(3.8,2.075)
  rect 1.524x1.3 smd paste+0 mask+0.051: A(-2,-2.075) B(2,-2.075) C(0,-2.075)
  round 0 hole 0.7 unplated paste-2539.97: ""(-1.2,-0.625) ""(1.2,-0.625)
  silkscreen extent -3.3,-2.07 3.3,4.83, body extent -3.8,-2.24 3.8,4.56, height 2.71
FH12-40S-0.5SH(55) [mm]
  rect 0.3x1.3 smd: 1(-9.75,1.625) 2(-9.25,1.625) 3(-8.75,1.625) 4(-8.25,1.625) 5(-7.75,1.625) 6(-7.25,1.625) 7(-6.75,1.625) 8(-6.25,1.625) 9(-5.75,1.625) 10(-5.25,1.625) 11(-4.75,1.625) 12(-4.25,1.625) 13(-3.75,1.625) 14(-3.25,1.625) 15(-2.75,1.625) 16(-2.25,1.625) 17(-1.75,1.625) 18(-1.25,1.625) 19(-0.75,1.625) 20(-0.25,1.625) 21(0.25,1.625) 22(0.75,1.625) 23(1.25,1.625) 24(1.75,1.625) 25(2.25,1.625) 26(2.75,1.625) 27(3.25,1.625) 28(3.75,1.625) 29(4.25,1.625) 30(4.75,1.625) 31(5.25,1.625) 32(5.75,1.625) 33(6.25,1.625) 34(6.75,1.625) 35(7.25,1.625) 36(7.75,1.625) 37(8.25,1.625) 38(8.75,1.625) 39(9.25,1.625) 40(9.75,1.625)
  rect 1.8x2.2 smd: MP1(-11.65,-1.625) MP2(11.65,-1.625)
  silkscreen extent -11.65,-3.71 11.65,2.64, body extent -12.05,-3.65 12.05,1.75, height 4.8
Fuse-0805 [mm]
  rect 1x1.7 smd: 1(-1.1,0) 2(1.1,0)
  silkscreen extent -0.41,-0.81 0.41,0.81, body extent -1.1,-0.75 1.1,0.75, height 1.24
GT-TC032A-H015-L1 [mm]
  rect 1.05x1.8 smd: 1(-1.675,0) 2(1.675,0)
  silkscreen extent -1.55,-1.25 1.55,1.25, body extent -2,-1.26 2,1.24, height 1.6
IND-0201 [mm]
  rect 0.25x0.3 smd mask+0.055: 1(-0.275,0) 2(0.275,0)
  silkscreen extent -0.48,-0.23 0.48,0.23, body extent -0.3,-0.15 0.3,0.15, height 0.15
LED-0402 [mm]
  rect 0.62x0.72 smd: 1(-0.475,0) 2(0.475,0)
  silkscreen extent -0.89,-0.51 1.55,0.51, body extent -0.5,-0.25 0.51,0.25, height 0.45
PSPMAA0412-1R0M-ANP_ [mm] "IND SMD 1uH"
  rect 1.4x2.3 smd: 1(-1.775,0) 2(1.775,0)
  silkscreen extent -2.21,-2.1 2.21,2.1, body extent -2.2,-2.1 2.2,2.1, height 1.1
QFN-24(4x4) [mm]
  rect 0.665x0.28 smd paste-100 mask+0.05: 1(-1.908,1.25) 2(-1.908,0.75) 3(-1.908,0.25) 4(-1.908,-0.25) 5(-1.908,-0.75) 6(-1.908,-1.25) 13(1.908,-1.25) 14(1.908,-0.75) 15(1.908,-0.25) 16(1.908,0.25) 17(1.908,0.75) 18(1.908,1.25)
  rect 0.28x0.665 smd paste-100 mask+0.05: 7(-1.25,-1.908) 8(-0.75,-1.908) 9(-0.25,-1.908) 10(0.25,-1.908) 11(0.75,-1.908) 12(1.25,-1.908) 19(1.25,1.908) 20(0.75,1.908) 21(0.25,1.908) 22(-0.25,1.908) 23(-0.75,1.908) 24(-1.25,1.908)
  rect 2.55x2.55 smd paste-100 mask+0.05: 25(0,0)
  silkscreen extent -2.46,-2.08 2.08,2.08, body extent -2,-2 2,2, height 0.91
Res-0402 [mil]
  rect 18x25 smd mask+2.17: 1(-18.5,0) 2(18.5,0)
  silkscreen extent -32,-17 32,16, body extent -23,-11 23,11, height 16
Res-0603 [mil]
  rect 30x35 smd: 1(-30,0) 2(30,0)
  silkscreen extent -48,-21 48,21, body extent -31,-17 31,17, height 18
RES-0805 [mil] "SMD 0805"
  rect 40x50 smd: 1(-40,0) 2(40,0)
  silkscreen extent -64,-29 64,29, body extent -39,-25 39,24, height 24
SC-70-6 [mm]
  rect 1.15x0.4 smd: 1(-0.89,0.65) 2(-0.89,0) 3(-0.89,-0.65) 4(0.89,-0.65) 5(0.89,0) 6(0.89,0.65)
  silkscreen extent -1.74,-1.07 0.63,1.07, body extent -1.05,-1 1.05,1, height 1.1
SMA [mm]
  rect 2.5x1.7 smd: 1(-2,0) 2(2,0)
  silkscreen extent -4.45,-1.42 2.06,1.42, body extent -2.6,-1.3 2.6,1.3, height 2.4
SOD323F [mm]
  rect 0.6x0.6 smd: 1(-1.05,0) 2(1.05,0)
  silkscreen extent -0.91,-0.79 2.11,0.79, body extent -1.25,-0.67 1.25,0.68, height 1
SOD-123 [mm]
  rect 0.95x0.9 smd: 1(-1.575,0) 2(1.575,0)
  silkscreen extent -1.37,-0.8 2.82,0.8, body extent -1.82,-0.78 1.83,0.78, height 1.5
"SOD-123 (Bi-Directional)" [mm]
  rect 0.93x1.06 smd paste+0 mask+0.051: 1(1.685,0) 2(-1.685,0)
  silkscreen extent -1.43,-0.98 1.43,0.98, body extent -1.83,-0.9 1.83,0.9, height 1.07
"SOD-882 Bi Directional" [mm]
  rect 0.5x0.8 smd mask+0.055: 1(-0.35,0) 2(0.35,0)
  silkscreen extent -0.69,-0.48 0.69,0.48, body extent -0.49,-0.29 0.49,0.29, height 0.48
"SOIC-8 (208 mil)" [mm]
  rect 1.61x0.58 smd: 1(-3.605,1.905) 2(-3.605,0.635) 3(-3.605,-0.635) 4(-3.605,-1.905) 5(3.605,-1.905) 6(3.605,-0.635) 7(3.605,0.635) 8(3.605,1.905)
  silkscreen extent -4.7,-2.69 2.69,2.69, body extent -3.95,-2.64 3.95,2.64, height 2.16
SOT-23 [mm] "TRANS NPN 40V 0.6A SOT23"
  rect 0.82x0.92 smd: 1(-0.95,-1) 2(0.95,-1) 3(0,1)
  silkscreen extent -1.68,-1.3 1.55,0.81, body extent -1.5,-1.25 1.5,1.25, height 1.05
sot-23 [mm] "TRANS NPN 40V 0.6A SOT23"
  rect 0.82x0.92 smd: 1(-0.95,-1) 2(0.95,-1) 3(0,1)
  silkscreen extent -1.68,-1.3 1.55,0.81, body extent -1.5,-1.25 1.5,1.25, height 1.05
Tant-1206 [mil]
  rect 60x70 smd: 1(-50,0) 2(50,0)
  silkscreen extent -84,-39 84,39, body extent -63,-31 63,31, height 71
TP12422673 [mm]
  rect 0.9x1.8 smd: 1(-2.45,-1.2) 2(2.45,-1.2) MP(-3.65,1.2) MP(3.65,1.2)
  round 0 hole 1.1 unplated: MH(-1,-0.7) MH(1,-0.7)
  silkscreen extent -3.43,-1.73 3.53,2.26, body extent -3.97,-1.97 3.98,5.45, height 3.52
TYPE-C-31-M-17_ [mm]
  rect 0.7x1.6 smd: A5(-0.5,1.99) A9(1.52,1.99) B5(0.5,1.99) B9(-1.52,1.99)
  rect 0.9x1.6 smd: A12(2.75,1.99) B12(-2.75,1.99)
  oval 1x1.7 hole 0.52 slot 1.2 at 90 deg: MH1(4.32,1.81) MH4(-4.32,1.81)
  oval 1x1.75 hole 0.52 slot 1.2 at 90 deg: MH2(4.32,-1.99) MH3(-4.32,-1.99)
  silkscreen extent -4.32,-0.88 4.32,0.75, body extent -4.47,-4.59 4.47,2.21, height 3.21
VFSOP-8-2.3mm [mm]
  rect 0.7x0.3 smd paste+0 mask+0.051: 1(-1.35,0.75) 2(-1.35,0.25) 3(-1.35,-0.25) 4(-1.35,-0.75) 5(1.35,-0.75) 6(1.35,-0.25) 7(1.35,0.25) 8(1.35,0.75)
  silkscreen extent -1.93,-1.07 0.86,1.07, body extent -1.65,-1 1.65,1, height 1
"Voltlink Target" [mm]
  rect 0.5x1.6 smd: 1(-2.5,-1.262) 2(-1.5,-1.262) 3(-0.5,-1.262) 4(0.5,-1.262) 5(1.5,-1.262) 6(2.5,-1.262)
  rect 1.2x1.8 smd: MP1(-3.8,1.262) MP2(3.8,1.262)
  silkscreen extent -4.06,-1.68 4.06,2.17, body extent -4,-1.49 4,2.11, height 4.25
WAFER-PH2.0-2PWB [mm]
  rect 1x3.5 smd: 1(-1,2.85) 2(1,2.85)
  rect 1.5x3.5 smd: MP1(-3.35,-2.85) MP2(3.35,-2.85)
  silkscreen extent -4.09,-4.85 4.04,3.56, body extent -4.03,-4.8 3.97,3.7, height 5.59
X322540MPB4SI_ [mm]
  rect 1.4x1.2 smd: 1(-1.1,-0.85) 2(1.1,-0.85) 3(1.1,0.85) 4(-1.1,0.85)
  silkscreen extent -2.13,-1.3 1.65,1.3, body extent -1.6,-1.25 1.6,1.25, height 0.8
YSPI0520-2R2M_ [mm]
  rect 2x2.5 smd: 1(-2.5,0) 2(2.5,0)
  silkscreen extent -2.7,-2.6 2.7,2.6, body extent -2.7,-2.6 2.7,2.6, height 1.8

## Part data
C1 C11 C12: library part GRM188Z71A106KA73D, "CAP CER 10UF 10V X7R 0603", Case/Package=345Case, LCSC Part Number=C2959727, Manufacturer=Murata, Max Operating Temperature=125°C, Min Operating Temperature=-55°C, Tolerance=10%, Voltage Rating=10V, ComponentLink1Description=https://datasheet.octopart.com/GRM188Z71A106KA73D-Murata-datasheet-165579666.pdf?src-supplier=TME, ComponentLink1URL=https://datasheet.octopart.com/GRM188Z71A106KA73D-Murata-datasheet-165579666.pdf?src-supplier=TME, Height=1mm, Item Type=Capacitor, Length=1.6mm, Manufacturer Part Number=GRM188Z71A106KA73D, Material=4241ConductorMaterial, Pricing="1=0.36, 10=0.155, 50=0.155, 100=0.104, 1000=0.094, 10000=0.065 (USD)", RoHS=Yes, RoHS Compliant=Yes, Stock=390983, Supplier=Mouser, Thickness=800um, Width=800um
C2 C13 C14 C15 C18 C24 C25: library part CC0402JRX7R7BB104, "CAP CER 0.1UF 16V X7R 0402", Case Code (Imperial)=0402, Case Code (Metric)=1005, Dielectric=X7R, LCSC Part Number=C541464, Manufacturer=Yageo, Max Operating Temperature=125°C, Min Operating Temperature=-55°C, Package Quantity=10000, Supplier Part Number=311-1676-1-ND, Tolerance=5%, Voltage Rating=16V, Case/Package=0402, Category="Ceramic Capacitors", ComponentLink1Description=https://datasheet.ciiva.com/13210/upy-gphc-x7r-6-3v-to-50v-8-12304-13210152.pdf?src-supplier=Mouser, ComponentLink1URL=https://datasheet.ciiva.com/13210/upy-gphc-x7r-6-3v-to-50v-8-12304-13210152.pdf?src-supplier=Mouser, Construction=Flat, Halogen Free="Halogen Free", Height=0.5mm, Item Type=Capacitor, Lead Free="Lead Free", Length=0.039inch, Manufacturer Part Number=CC0402JRX7R7BB104, Material=4241ConductorMaterial, Mounting Technology="Surface Mount", Packaging="Tape and Reel", Pricing="1=0.1, 10=0.046, 50=0.0262, 100=0.0203, 500=0.01528, 1000=0.012, 2500=0.01091, 5000=0.01004 (USD)", RoHS=Yes, RoHS Compliant=Yes, Series=CC, Stock=1659111, Supplier=Digikey, Thickness=0.022inch, Voltage Rating (DC)=16V, Width=0.02inch
C3 C5: library part CC0402MRX5R6BB106, "CAP CER 10UF 10V X5R 0402", Case Code (Imperial)=0402, Case Code (Metric)=1005, LCSC Part Number=C962143, Manufacturer=Yageo, Max Operating Temperature=85°C, Min Operating Temperature=-55°C, Supplier Part Number 1=6097631, Tolerance=20%, Voltage Rating=10V, Capacitance=10uF, Case/Package=0402, Category="Ceramic Capacitors", ComponentLink1Description=http://www.yageo.com/documents/recent/UPY-GPHC_X5R_4V-to-50V_25.pdf?src-supplier=Digi-Key, ComponentLink1URL=http://www.yageo.com/documents/recent/UPY-GPHC_X5R_4V-to-50V_25.pdf?src-supplier=Digi-Key, Item Type=Capacitor, Manufacturer Part Number=CC0402MRX5R6BB106, Mount="Surface Mount", Packaging="Tape and Reel", Pricing 1="10000=0.02650, 20000=0.02590, 30000=0.02550, 40000=0.02530, 50000=0.02450 (USD)", RoHS=Yes, RoHS Compliant=Yes, Stock 1=80000, Supplier 1="Future Electronics"
C4: library part CC0805MKX5R5BB476, "CAP CER 47UF 6.3V X5R 0805", Case Code (Imperial)=0805, Case Code (Metric)=2012, Dielectric=X5R, LCSC Part Number=C109461, Manufacturer=Yageo, Max Operating Temperature=85°C, Min Operating Temperature=-55°C, Resistor Type=Ceramic, Tolerance=20%, Voltage Rating=6.3V, Capacitance=47uF, Case/Package=0805, Category="Ceramic Capacitors", ComponentLink1Description=http://www.mouser.com/ds/2/447/UPY-GPHC_X5R_4V-to-50V_25-1131599.pdf?src-supplier=Mouser, ComponentLink1URL=http://www.mouser.com/ds/2/447/UPY-GPHC_X5R_4V-to-50V_25-1131599.pdf?src-supplier=Mouser, ComponentLink2Description=http://www.yageo.com/documents/recent/UPY-GPHC_X5R_4V-to-50V_25.pdf?src-supplier=Digi-Key, ComponentLink2URL=http://www.yageo.com/documents/recent/UPY-GPHC_X5R_4V-to-50V_25.pdf?src-supplier=Digi-Key, ComponentLink3Description=http://www.yageo.com/documents/recent/UPY-GPHC_X5R_4V-to-50V_19.pdf?src-supplier=Avnet, ComponentLink3URL=http://www.yageo.com/documents/recent/UPY-GPHC_X5R_4V-to-50V_19.pdf?src-supplier=Avnet, Construction=Flat, Depth=1.25mm, Halogen Free="Halogen Free", Item Type=Capacitor, Lead Free="Lead Free", Length=2mm, Manufacturer Part Number=CC0805MKX5R5BB476, Mount="Surface Mount", Packaging="Tape and Reel", Pricing 1="1=0.25650 (USD)", Radiation Hardening=No, RoHS=Yes, RoHS Compliant=Yes, Series=CC, Stock 1=6, Supplier 1="Arrow Electronics", Supplier Part Number 1=CC0805MKX5R5BB476, Termination=SMD/SMT, Thickness=0.057inch, Voltage Rating (DC)=6.3V, Weight=0.000194oz, Width=0.049inch
C6 C36: library part CC0201BRNPO9BN4R7, "CAP CER 4.7PF 50V C0G/NPO 0201", Case/Package=0201, LCSC Part Number=C505471, Manufacturer=Yageo, Max Operating Temperature=125°C, Min Operating Temperature=-55°C, Voltage Rating=50V, Category="Ceramic Capacitors", ComponentLink1Description=https://www.yageo.com/upload/media/product/productsearch/datasheet/mlcc/UPY-GP_NP0_16V-to-50V_18.pdf?src-supplier=Digi-Key, ComponentLink1URL=https://www.yageo.com/upload/media/product/productsearch/datasheet/mlcc/UPY-GP_NP0_16V-to-50V_18.pdf?src-supplier=Digi-Key, ComponentLink2Description=http://www.yageo.com/documents/recent/UPY-GP_NP0_16V-to-50V_16.pdf?src-supplier=Digi-Key, ComponentLink2URL=http://www.yageo.com/documents/recent/UPY-GP_NP0_16V-to-50V_16.pdf?src-supplier=Digi-Key, Item Type=Capacitor, Length=0.024inch, Manufacturer Part Number=CC0201BRNPO9BN4R7, Mounting Technology="Surface Mount", Packaging="Tape and Reel", Pricing="15000=0.0023 (USD)", RoHS=Yes, RoHS Compliant=Yes, Series=CC, Stock=210000, Supplier="Arrow Electronics", Supplier Part Number=CC0201BRNPO9BN4R7, Thickness=0.013inch, Width=0.012inch
C8 C16 C17: library part C1608X7R1E105K080AB, "CAP CER 1UF 25V X7R 0603", Case Code (Imperial)=0603, Case Code (Metric)=1608, Dielectric=X7R, Dielectric Material=4241ConductorMaterial, Manufacturer=TDK, Max Operating Temperature=125°C, Min Operating Temperature=-55°C, Package Quantity=1, Tolerance=10%, Voltage=25V, Case/Package=0603, ComponentLink1Description=https://datasheet.ciiva.com/23802/1796654-23802776.pdf?src-supplier=Newark, ComponentLink1URL=https://datasheet.ciiva.com/23802/1796654-23802776.pdf?src-supplier=Newark, ComponentLink2Description=https://datasheet.ciiva.com/22725/1913358-22725530.pdf?src-supplier=Element14, ComponentLink2URL=https://datasheet.ciiva.com/22725/1913358-22725530.pdf?src-supplier=Element14, ComponentLink3Description=https://datasheet.ciiva.com/28693/mlcc-commercial-general-en-28693447.pdf?src-supplier=Element14, ComponentLink3URL=https://datasheet.ciiva.com/28693/mlcc-commercial-general-en-28693447.pdf?src-supplier=Element14, ComponentLink4Description=https://datasheet.ciiva.com/6290/tdkmlcccaprange-6290854.pdf?src-supplier=Digikey, ComponentLink4URL=https://datasheet.ciiva.com/6290/tdkmlcccaprange-6290854.pdf?src-supplier=Digikey, ComponentLink5Description=https://datasheet.ciiva.com/26834/getdatasheetpartid-727834-26834380.pdf?src-supplier=Verical, ComponentLink5URL=https://datasheet.ciiva.com/26834/getdatasheetpartid-727834-26834380.pdf?src-supplier=Verical, Construction=Flat, Depth=0.8mm, Height=0.8mm, Item Type=Capacitors, Lead Free="Lead Free", Length=1.6mm, Manufacturer Part Number=C1608X7R1E105K080AB, Material=4241ConductorMaterial, Mounting Technology="Surface Mount", Packaging="Tape and Reel", Pricing="1=0.18, 10=0.103, 50=0.0722, 100=0.0627, 500=0.04664, 1000=0.04163 (USD)", Radiation Hardening=No, Reach SVHC Compliant=No, RoHS=Yes, RoHS Compliant=Yes, Series=C, Stock=239206, Supplier=Digikey, Thickness=0.037inch, Voltage Rating=25V, Width=0.031inch
C9: library part CC0603JRNPO9BN103, "CAP CER 10000PF 50V C0G/NPO 0603", Case/Package=0603, LCSC Part Number=C389113, Manufacturer=Yageo, Max Operating Temperature=125°C, Min Operating Temperature=-55°C, Tolerance=5%, Voltage Rating=50V, Capacitance=10nF, Category="Ceramic Capacitors", ComponentLink1Description=http://www.yageo.com/documents/recent/UPY-GP_NP0_16V-to-50V_16.pdf?src-supplier=Digi-Key, ComponentLink1URL=http://www.yageo.com/documents/recent/UPY-GP_NP0_16V-to-50V_16.pdf?src-supplier=Digi-Key, ComponentLink2Description=http://www.yageo.com/exep/pages/download/literatures/ProductSelectionGuide%202014_Final_2.pdf?src-supplier=Digi-Key, ComponentLink2URL=http://www.yageo.com/exep/pages/download/literatures/ProductSelectionGuide%202014_Final_2.pdf?src-supplier=Digi-Key, Item Type=Capacitor, Length=0.063inch, Manufacturer Part Number=CC0603JRNPO9BN103, Mount="Surface Mount", Packaging="Tape and Reel", Pricing 1="1=0.42340, 10=0.29770, 25=0.25590, 100=0.19550, 250=0.19360, 500=0.14320, 1000=0.12060, 3000=0.11930 (USD)", RoHS=Yes, RoHS Compliant=Yes, Stock 1=5425, Supplier 1="Arrow Electronics", Supplier Part Number 1=CC0603JRNPO9BN103, Thickness=0.035inch, Width=0.031inch
C10: library part GRM21BZ71A226ME15L, "CAP CER 22UF 10V X7R 0805", LCSC Part Number=C907991, Manufacturer=Murata, Max Operating Temperature=125°C, Min Operating Temperature=-55°C, Package=0805, Supplier Part Number=490-GRM21BZ71A226ME15LCT-ND, Tolerance=20%, Voltage Rating=10V, Category="Ceramic Capacitors", ComponentLink1Description=https://datasheet.octopart.com/GRM21BZ71A226ME15L-Murata-datasheet-165579666.pdf?src-supplier=TME, ComponentLink1URL=https://datasheet.octopart.com/GRM21BZ71A226ME15L-Murata-datasheet-165579666.pdf?src-supplier=TME, ComponentLink2Description=LCSC, ComponentLink2URL=https://www.lcsc.com/product-detail/Multilayer-Ceramic-Capacitors-MLCC-SMD-SMT_Murata-Electronics-GRM21BZ71A226ME15L_C907991.html, Height=1.45mm, Item Type=Capacitor, Length=2mm, Manufacturer Part Number=GRM21BZ71A226ME15L, Material=4241ConductorMaterial, Pricing="1=0.39, 10=0.259, 50=0.191, 100=0.1556, 500=0.12282, 1000=0.10372 (USD)", RoHS=Yes, Stock=49126, Supplier=Digi-Key, Thickness=1.25mm, Width=1.25mm
C19 C33 C41 C44 C49 C50 C51 C53: library part GRM155C71C105KE11D, "CAP CER 1UF 16V X7S 0402", Case/Package=343Case, Dielectric=1542DielectricType, LCSC Part Number=C576449, Manufacturer=Murata, Max Operating Temperature=125°C, Min Operating Temperature=-55°C, Tolerance=10%, Voltage Rating=16V, Height=600um, Item Type=Capacitors, Length=1mm, Manufacturer Part Number=GRM155C71C105KE11D, Material=4241ConductorMaterial, Pricing="1=0.11, 10=0.041, 50=0.041, 100=0.026, 1000=0.023, 10000=0.016 (USD)", RoHS=No, Stock=16102, Supplier=Mouser, Thickness=500um, Voltage Rating (DC)=16V, Width=500um
C20 C29 C31 C32 C34 C39 C40 C46 C47 C48 C52: library part CC0402KRX5R8BB104, "CAP CER 0.1UF 25V X5R 0402", Case Code (Imperial)=0402, Case Code (Metric)=1005, Dielectric=X5R, LCSC Part Number=C106256, Manufacturer=Yageo, Max Operating Temperature=85°C, Min Operating Temperature=-55°C, Resistor Type=Ceramic, Supplier Part Number 1=311-1697-1-ND, Tolerance=10%, Voltage Rating=25V, Capacitance=100nF, Case/Package=0402, Category="Ceramic Capacitors", ComponentLink1Description=http://www.mouser.com/ds/2/447/UPY-GPHC_X5R_4V-to-50V_25-1131599.pdf?src-supplier=Mouser, ComponentLink1URL=http://www.mouser.com/ds/2/447/UPY-GPHC_X5R_4V-to-50V_25-1131599.pdf?src-supplier=Mouser, ComponentLink2Description=http://www.yageo.com/documents/recent/UPY-GPHC_X5R_4V-to-50V-16.pdf?src-supplier=Future+Electronics, ComponentLink2URL=http://www.yageo.com/documents/recent/UPY-GPHC_X5R_4V-to-50V-16.pdf?src-supplier=Future+Electronics, ComponentLink3Description=http://www.yageo.com/documents/recent/UPY-GPHC_X5R_4V-to-50V_25.pdf?src-supplier=Digi-Key, ComponentLink3URL=http://www.yageo.com/documents/recent/UPY-GPHC_X5R_4V-to-50V_25.pdf?src-supplier=Digi-Key, Depth=0.5mm, Halogen Free="Halogen Free", Item Type=Capacitor, Lead Free="Lead Free", Length=0.039inch, Manufacturer Part Number=CC0402KRX5R8BB104, Mount="Surface Mount", Packaging="Tape and Reel", Pricing 1="1=0.10000, 10=0.03800, 50=0.02100, 100=0.01710, 500=0.01224, 1000=0.00961, 2500=0.00874, 5000=0.00804 (USD)", RoHS=Yes, RoHS Compliant=Yes, Series=CC, Stock 1=4598218, Supplier 1=Digi-Key, Thickness=0.022inch, Voltage Rating (DC)=25V, Width=0.02inch
C21 C37 C38: library part CC0603MRX5R6BB226, "CAP CER 22UF 10V X5R 0603", Case Code (Imperial)=0603, Case Code (Metric)=1608, Dielectric=X5R, LCSC Part Number=C109447, Manufacturer=Yageo, Max Operating Temperature=85°C, Min Operating Temperature=-55°C, Package Quantity=4000, Supplier Part Number 1=311-1819-1-ND, Tolerance=20%, Voltage Rating=10V, Capacitance=22uF, Case/Package=0603, Category="Ceramic Capacitors", ComponentLink1Description=http://www.mouser.com/ds/2/447/Yageo_UPY-GP_NP0_16V-to-50V_9-358835.pdf?src-supplier=Mouser, ComponentLink1URL=http://www.mouser.com/ds/2/447/Yageo_UPY-GP_NP0_16V-to-50V_9-358835.pdf?src-supplier=Mouser, ComponentLink2Description=http://www.yageo.com/documents/recent/UPY-GPHC_X5R_4V-to-50V_25.pdf?src-supplier=Digi-Key, ComponentLink2URL=http://www.yageo.com/documents/recent/UPY-GPHC_X5R_4V-to-50V_25.pdf?src-supplier=Digi-Key, Halogen Free="Halogen Free", Height=0.8mm, Item Type=Capacitor, Lead Free="Lead Free", Length=0.063inch, Manufacturer Part Number=CC0603MRX5R6BB226, Mount="Surface Mount", Packaging="Tape and Reel", Pricing 1="1=0.68000, 10=0.48000, 50=0.36300, 100=0.31610, 500=0.23416, 1000=0.19903 (USD)", RoHS=Yes, RoHS Compliant=Yes, Stock 1=19628, Supplier 1=Digi-Key, Termination=SMD/SMT, Thickness=0.035inch, Voltage Rating (DC)=10V, Weight=7.1E-05oz, Width=0.8mm
C22 C23: library part CC0402KRX5R8BB103, "CAP CER 10000PF 25V X5R 0402", LCSC Part Number=C576726, Manufacturer=Yageo, Supplier Part Number 1=2101932, Category="Ceramic Capacitors", ComponentLink1Description=LCSC, ComponentLink1URL=https://www.lcsc.com/product-detail/Multilayer-Ceramic-Capacitors-MLCC-SMD-SMT_YAGEO-CC0402KRX5R8BB103_C576726.html, Item Type=Capacitor, Manufacturer Part Number=CC0402KRX5R8BB103, Pricing 1="10000=0.00290, 40000=0.00270, 150000=0.00260, 250000=0.00250, 500000=0.00240 (USD)", RoHS=Yes, RoHS Compliant=Yes, Stock 1=140000, Supplier 1="Future Electronics"
C30: library part TMCMA1A476MTRF, "CAP TANT 47UF 20% 10V 1206", Case Code (Imperial)=1206, Case Code (Metric)=3216, ESR (Equivalent Series Resistance)=2.6R, LCSC Part Number=C4984790, Leakage Current=9.4uA, Manufacturer="Vishay Sprague", Max Operating Temperature=125°C, Min Operating Temperature=-55°C, Package Quantity=2000, Ripple Current=173mA, Tolerance=20%, Voltage Rating=10V, Case/Package=1206, ComponentLink1Description=http://www.farnell.com/datasheets/1948250.pdf?src-supplier=Farnell, ComponentLink1URL=http://www.farnell.com/datasheets/1948250.pdf?src-supplier=Farnell, ComponentLink2Description=http://www.mouser.com/ds/2/427/tmcm-515668.pdf?src-supplier=Mouser, ComponentLink2URL=http://www.mouser.com/ds/2/427/tmcm-515668.pdf?src-supplier=Mouser, ComponentLink3Description=http://www.farnell.com/datasheets/2245108.pdf?src-supplier=Farnell, ComponentLink3URL=http://www.farnell.com/datasheets/2245108.pdf?src-supplier=Farnell, ComponentLink4Description=http://www.farnell.com/datasheets/1948250.pdf?src-supplier=Element14, ComponentLink4URL=http://www.farnell.com/datasheets/1948250.pdf?src-supplier=Element14, ComponentLink5Description=http://www.vishay.com/docs/40178/tmcm.pdf?src-supplier=Avnet, ComponentLink5URL=http://www.vishay.com/docs/40178/tmcm.pdf?src-supplier=Avnet, Dissipation Factor=20%, Height=1.8mm, Item Type=Capacitors, Length=3.2mm, Manufacturer Part Number=TMCMA1A476MTRF, Mounting Technology="Surface Mount", Packaging="Tape and Reel", Pricing="1=0.44, 10=0.271, 50=0.271, 100=0.175, 1000=0.146, 10000=0.119 (USD)", Reach SVHC Compliant=Unknown, RoHS=Yes, RoHS Compliant=Yes, Series=TMCM, Stock=7380, Supplier=Mouser, Termination=SMD/SMT, Voltage Rating (DC)=10V, Weight=0.000571oz, Width=1.6mm
C35: library part CC0201CRNPO9BN2R7, "CAP CER 2.7PF 50V C0G/NPO 0201", Case Code (Imperial)=0201, Case Code (Metric)=0603, Dielectric=C0G, LCSC Part Number=C325439, Manufacturer=Yageo, Max Operating Temperature=125°C, Min Operating Temperature=-55°C, Voltage Rating=50V, Case/Package=0201, Category="Ceramic Capacitors", ComponentLink1Description=https://datasheet.ciiva.com/13208/upy-gp-np0-16v-to-50v-8-13208314.pdf?src-supplier=Mouser, ComponentLink1URL=https://datasheet.ciiva.com/13208/upy-gp-np0-16v-to-50v-8-13208314.pdf?src-supplier=Mouser, Item Type=Capacitor, Length=0.024inch, Manufacturer Part Number=CC0201CRNPO9BN2R7, Mounting Technology="Surface Mount", Packaging="Tape and Reel", Pricing="15000=0.0017 (USD)", RoHS=Yes, RoHS Compliant=Yes, Series=CC, Stock=15000, Supplier=Avnet, Supplier Part Number=CC0201CRNPO9BN2R7, Termination=SMD/SMT, Thickness=0.013inch, Voltage Rating (DC)=50V, Weight=6E-06oz, Width=0.012inch
C42 C43: library part CC0402JRNPO9BN180, "CAP CER 18PF 50V C0G/NPO 0402", Case Code (Imperial)=0402, Case Code (Metric)=1005, Dielectric=C0G, LCSC Part Number=C106202, Manufacturer=Yageo, Max Operating Temperature=125°C, Min Operating Temperature=-55°C, Temperature Coefficient=30ppm/°C, Tolerance=5%, Voltage=50V, Case/Package=0402, ComponentLink1Description=https://datasheet.ciiva.com/11788/0900766b80d84fbf-11788369.pdf?src-supplier=Rs, ComponentLink1URL=https://datasheet.ciiva.com/11788/0900766b80d84fbf-11788369.pdf?src-supplier=Rs, ComponentLink2Description=https://datasheet.ciiva.com/28450/1443161-28450232.pdf?src-supplier=Element14, ComponentLink2URL=https://datasheet.ciiva.com/28450/1443161-28450232.pdf?src-supplier=Element14, ComponentLink3Description=https://datasheet.ciiva.com/176/mlccorderingcode-176358.pdf?src-supplier=Digikey, ComponentLink3URL=https://datasheet.ciiva.com/176/mlccorderingcode-176358.pdf?src-supplier=Digikey, ComponentLink4Description=https://datasheet.ciiva.com/176/mlccorderingcode-176357.pdf?src-supplier=Digikey, ComponentLink4URL=https://datasheet.ciiva.com/176/mlccorderingcode-176357.pdf?src-supplier=Digikey, ComponentLink5Description=https://datasheet.ciiva.com/176/mlccorderingcode-176359.pdf?src-supplier=Digikey, ComponentLink5URL=https://datasheet.ciiva.com/176/mlccorderingcode-176359.pdf?src-supplier=Digikey, ComponentLink6Description=https://datasheet.ciiva.com/13208/upy-gp-np0-16v-to-50v-8-13208430.pdf?src-supplier=Mouser, ComponentLink6URL=https://datasheet.ciiva.com/13208/upy-gp-np0-16v-to-50v-8-13208430.pdf?src-supplier=Mouser, ComponentLink7Description=https://datasheet.ciiva.com/11587/upy-gp-np0-16v-to-50v-8-11587087.pdf?src-supplier=Avnet, ComponentLink7URL=https://datasheet.ciiva.com/11587/upy-gp-np0-16v-to-50v-8-11587087.pdf?src-supplier=Avnet, Depth=0.5mm, Halogen Free=5694HalogenFree, Height=0.5mm, Item Type=Capacitors, Lead Free="Lead Free", Length=1mm, Manufacturer Part Number=CC0402JRNPO9BN180, Mounting Technology="Surface Mount", Packaging="Tape and Reel", Pins=2, Radiation Hardening=No, Reach SVHC Compliant=No, RoHS=Yes, RoHS Compliant=Yes, Series=CC, Stock=12000, Supplier=Rs, Termination=SMD/SMT, Voltage Rating=50V, Voltage Rating (DC)=50V, Weight=2.3E-05oz, Width=0.5mm
C45: library part CC0402KRX5R6BB475, "CAP CER 4.7UF 10V X5R 0402", Case Code (Imperial)=0402, Case Code (Metric)=1005, LCSC Part Number=C326586, Manufacturer=Yageo, Max Operating Temperature=85°C, Min Operating Temperature=-55°C, Supplier Part Number 1=3871698, Tolerance=10%, Voltage Rating=10V, Capacitance=4.7uF, Case/Package=0402, Category="Ceramic Capacitors", ComponentLink1Description=http://www.yageo.com/documents/recent/UPY-GPHC_X5R_4V-to-50V_25.pdf?src-supplier=Digi-Key, ComponentLink1URL=http://www.yageo.com/documents/recent/UPY-GPHC_X5R_4V-to-50V_25.pdf?src-supplier=Digi-Key, Manufacturer Part Number=CC0402KRX5R6BB475, Mount="Surface Mount", Packaging="Cut Tape", Pricing 1="10000=0.02310, 50000=0.02100 (GBP)", RoHS=Yes, RoHS Compliant=Yes, Stock 1=20000, Supplier 1=Farnell
D1 D2 D3 D4: "9.2V 6.4V 5V SOD-123FL TVS ROHS", LCSC Part Number=C2980402, Manufacturer=GOODWORK, Package=SOD-123FL, ComponentLink1Description=LCSC, ComponentLink1URL=https://www.lcsc.com/product-detail/TVS_GOODWORK-SMF5-0CA_C2980402.html, Item Type="TVS Diode", Manufacturer Part Number=SMF5.0CA
D5: "40V Single 500mV@3A 3A SMA Schottky Barrier Diodes (SBD) ROHS", LCSC Part Number=C383313, Manufacturer=LRC, Package=SMA, ComponentLink1Description=LCSC, ComponentLink1URL=https://www.lcsc.com/product-detail/Schottky-Barrier-Diodes-SBD_LRC-SM340A_C383313.html, Item Type="Schottky Diode", Manufacturer Part Number=SM340A
D6 D7 D8 D9 D10 D11: "5V 10V 3.3V Bi-Directional SOD-882 ESD Protection Devices ROHS", LCSC Part Number=C172409, Manufacturer=LRC, Package=SOD-882, ComponentLink1Description=LCSC, ComponentLink1URL=https://www.lcsc.com/product-detail/span-style-background-color-ff0-ESD-span-Protection-Devices_LRC-LESD8D3-3CAT5G_C172409.html, Item Type="Protection Device", Manufacturer Part Number=LESD8D3.3CAT5G
D12: "DIODE ZENER 3.3V 200MW SOD323F", Forward Voltage=1V, LCSC Part Number=C2978865, Manufacturer="ON Semiconductor / Fairchild", Max Operating Temperature=150°C, Max Power Dissipation=200mW, Max Reverse Leakage Current=4.5uA, Min Operating Temperature=-65°C, Package Quantity=1, Supplier Part Number 1=MM3Z3V3BCT-ND, Test Current=5mA, Tolerance=2%, Working Voltage=3.3V, ComponentLink1Description=http://www.onsemi.com/pub/Collateral/MM3Z9V1B-D.pdf?src-supplier=Digi-Key, ComponentLink1URL=http://www.onsemi.com/pub/Collateral/MM3Z9V1B-D.pdf?src-supplier=Digi-Key, ComponentLink2Description=http://www.mouser.com/ds/2/149/MM3Z3V3B-187166.pdf?src-supplier=Mouser, ComponentLink2URL=http://www.mouser.com/ds/2/149/MM3Z3V3B-187166.pdf?src-supplier=Mouser, ComponentLink3Description=https://www.fairchildsemi.com/datasheets/MM/MM3Z9V1B.pdf?src-supplier=Avnet, ComponentLink3URL=https://www.fairchildsemi.com/datasheets/MM/MM3Z9V1B.pdf?src-supplier=Avnet, ComponentLink4Description=http://www.farnell.com/datasheets/1706525.pdf?src-supplier=Element14, ComponentLink4URL=http://www.farnell.com/datasheets/1706525.pdf?src-supplier=Element14, Element Configuration=Single, Height=1mm, Impedance=89R, Item Type=Diode, Lead Free="Lead Free", Length=1.3mm, Manufacturer Part Number=MM3Z3V3B, Mount="Surface Mount", Number of Pins=2, Packaging="Tape and Reel", Peak Reverse Current=4.5uA, Power Dissipation=200mW, Pricing 1="1=0.22, 10=0.18, 100=0.0956, 500=0.06288, 1000=0.04276 (USD)", Radiation Hardening=No, REACH SVHC="No SVHC", Stock 1=473644, Supplier 1=Digi-Key, Voltage Tolerance=2%, Weight=0.0276g, Width=1.7mm, Zener Voltage=3.3V